# Altium PCB STM32H743I-EVAL2PCBDESIGN.PcbDoc (part 1 of 23)
Units mil, origin at the board's own origin, x right, y up, seen from the top; angles counter-clockwise.
Board outline 6558 x 5417 mil, 8 copper layers (L1_TOP, L2_GND, L3_HS1, L4_POWER, L5_SIG, L6_HS2, L7_GND, L8_BOTTOM), stack 61.368 mil thick; 620 components, 588 nets, 2945 pads, 1724 vias.
Unrouted connection lines stored in the file: 1.
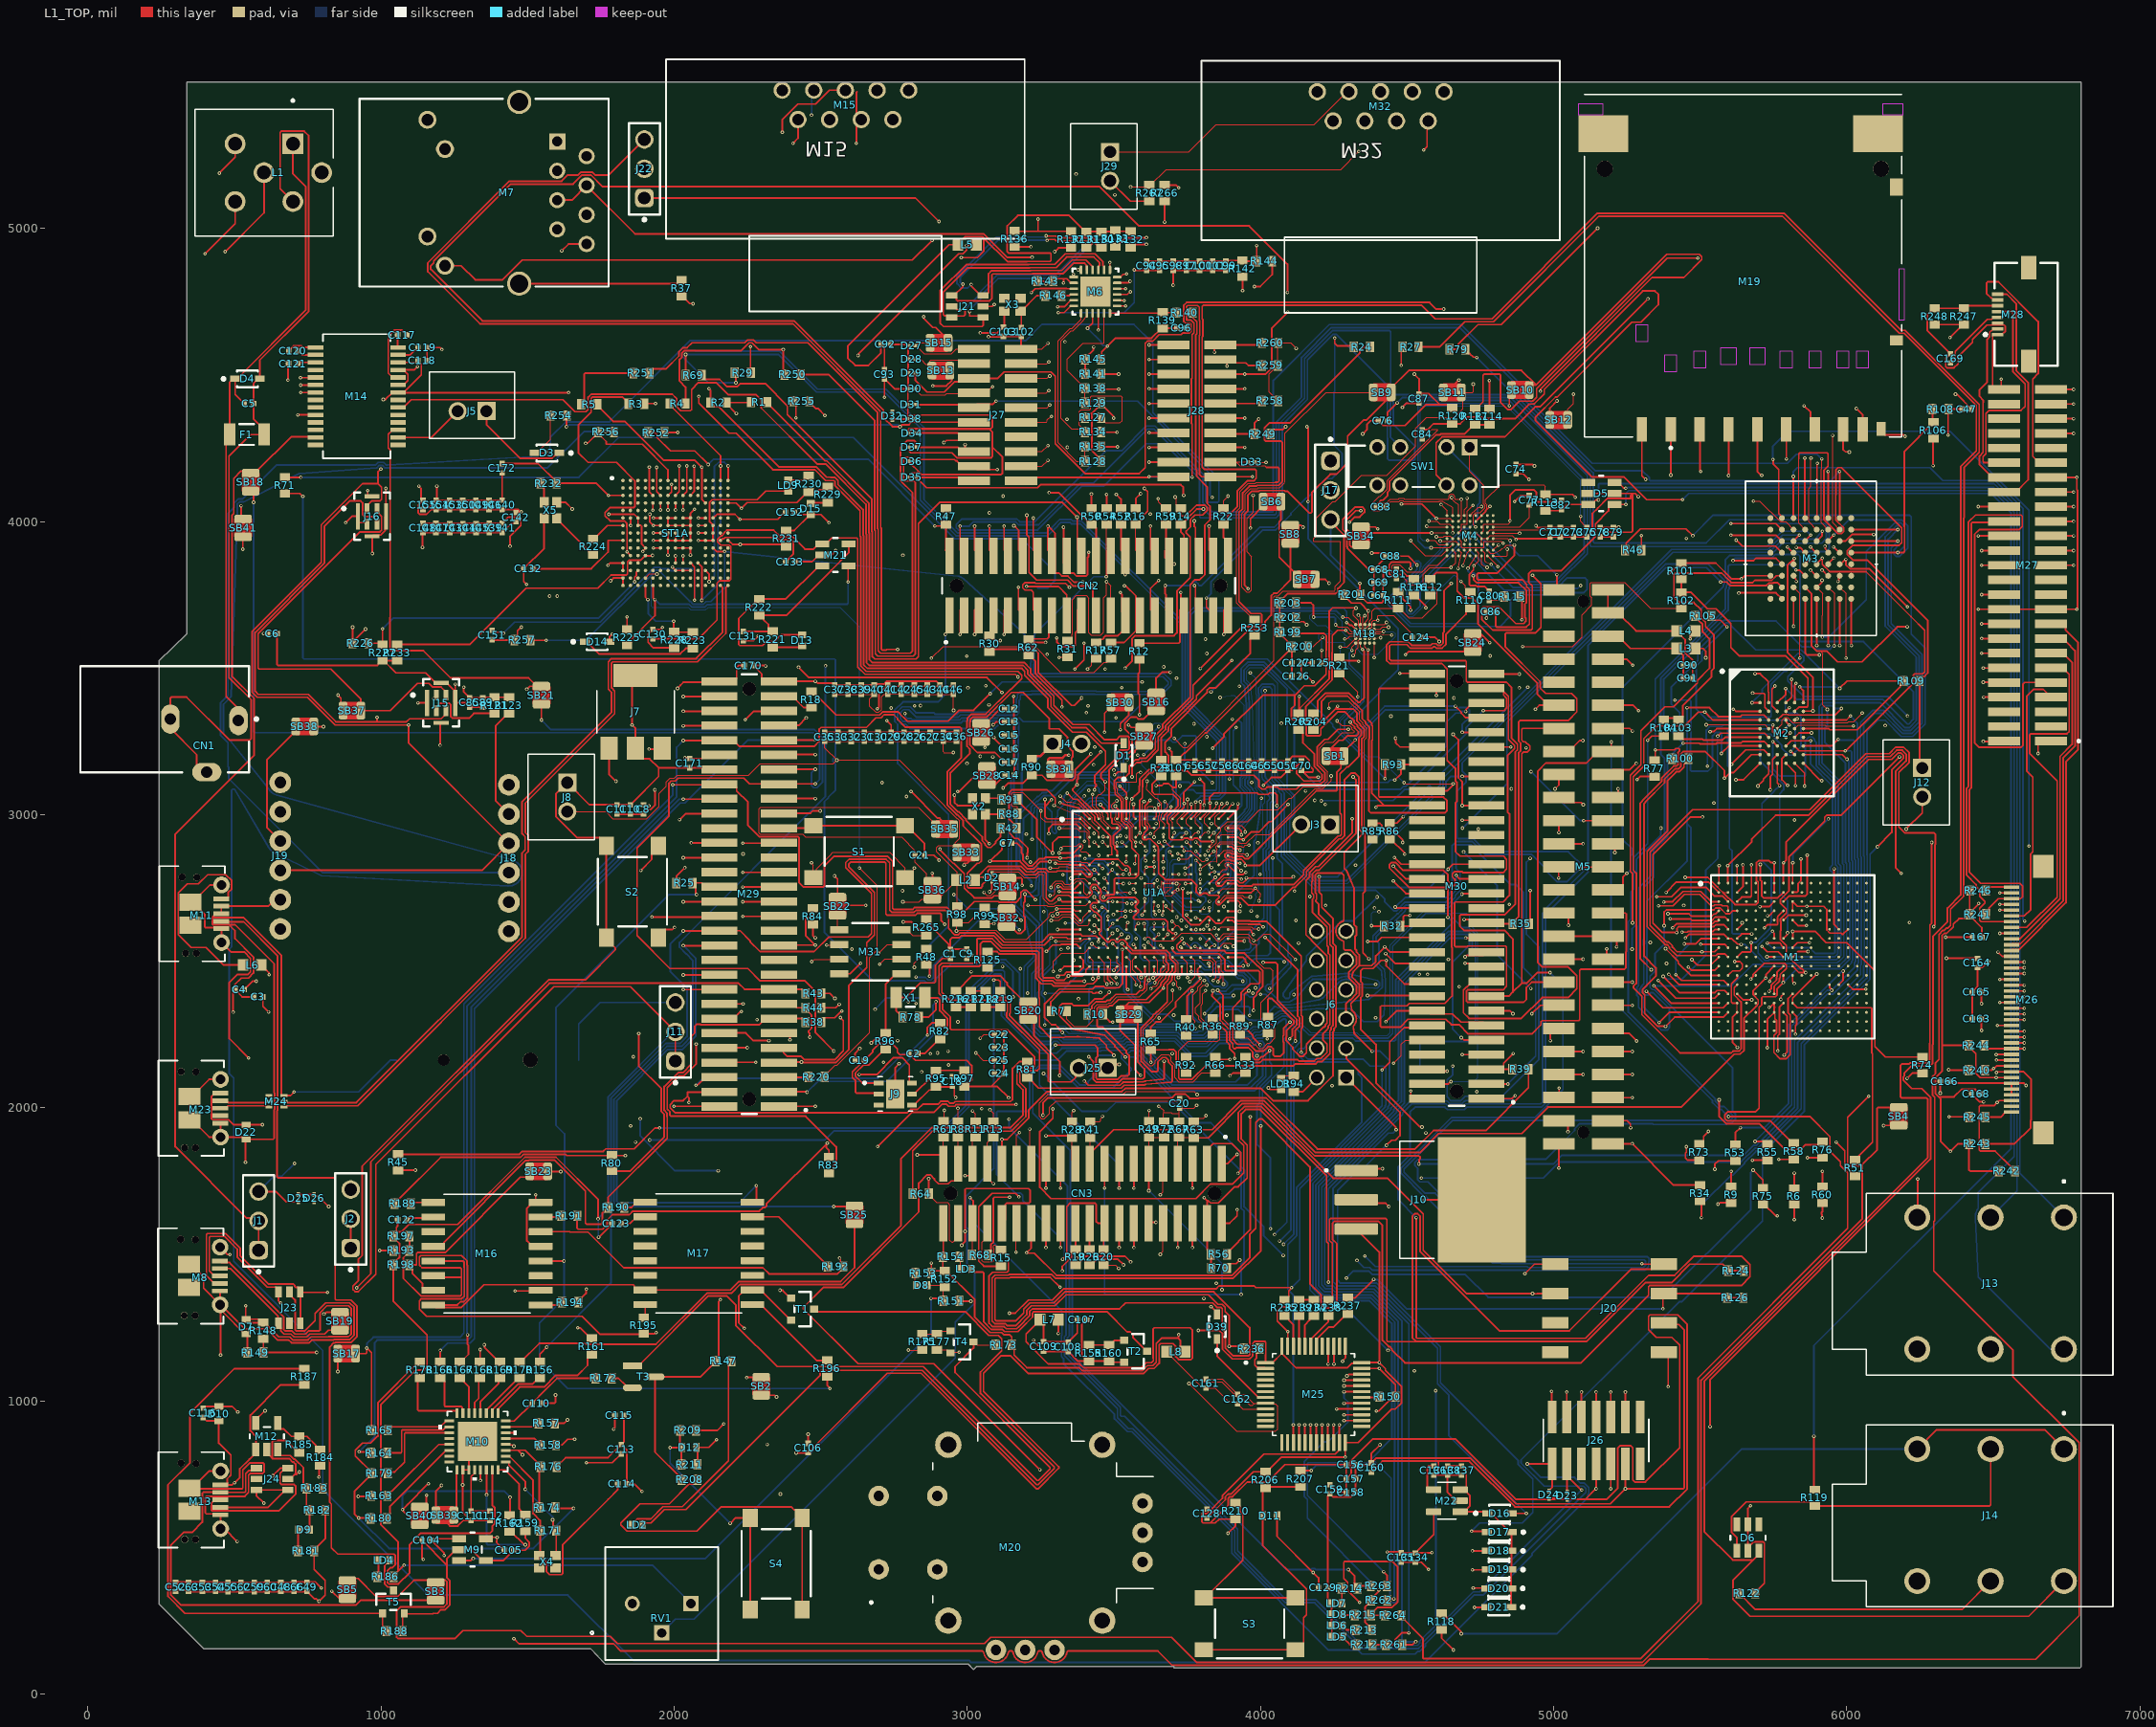
[diagram p0: L1_TOP view]
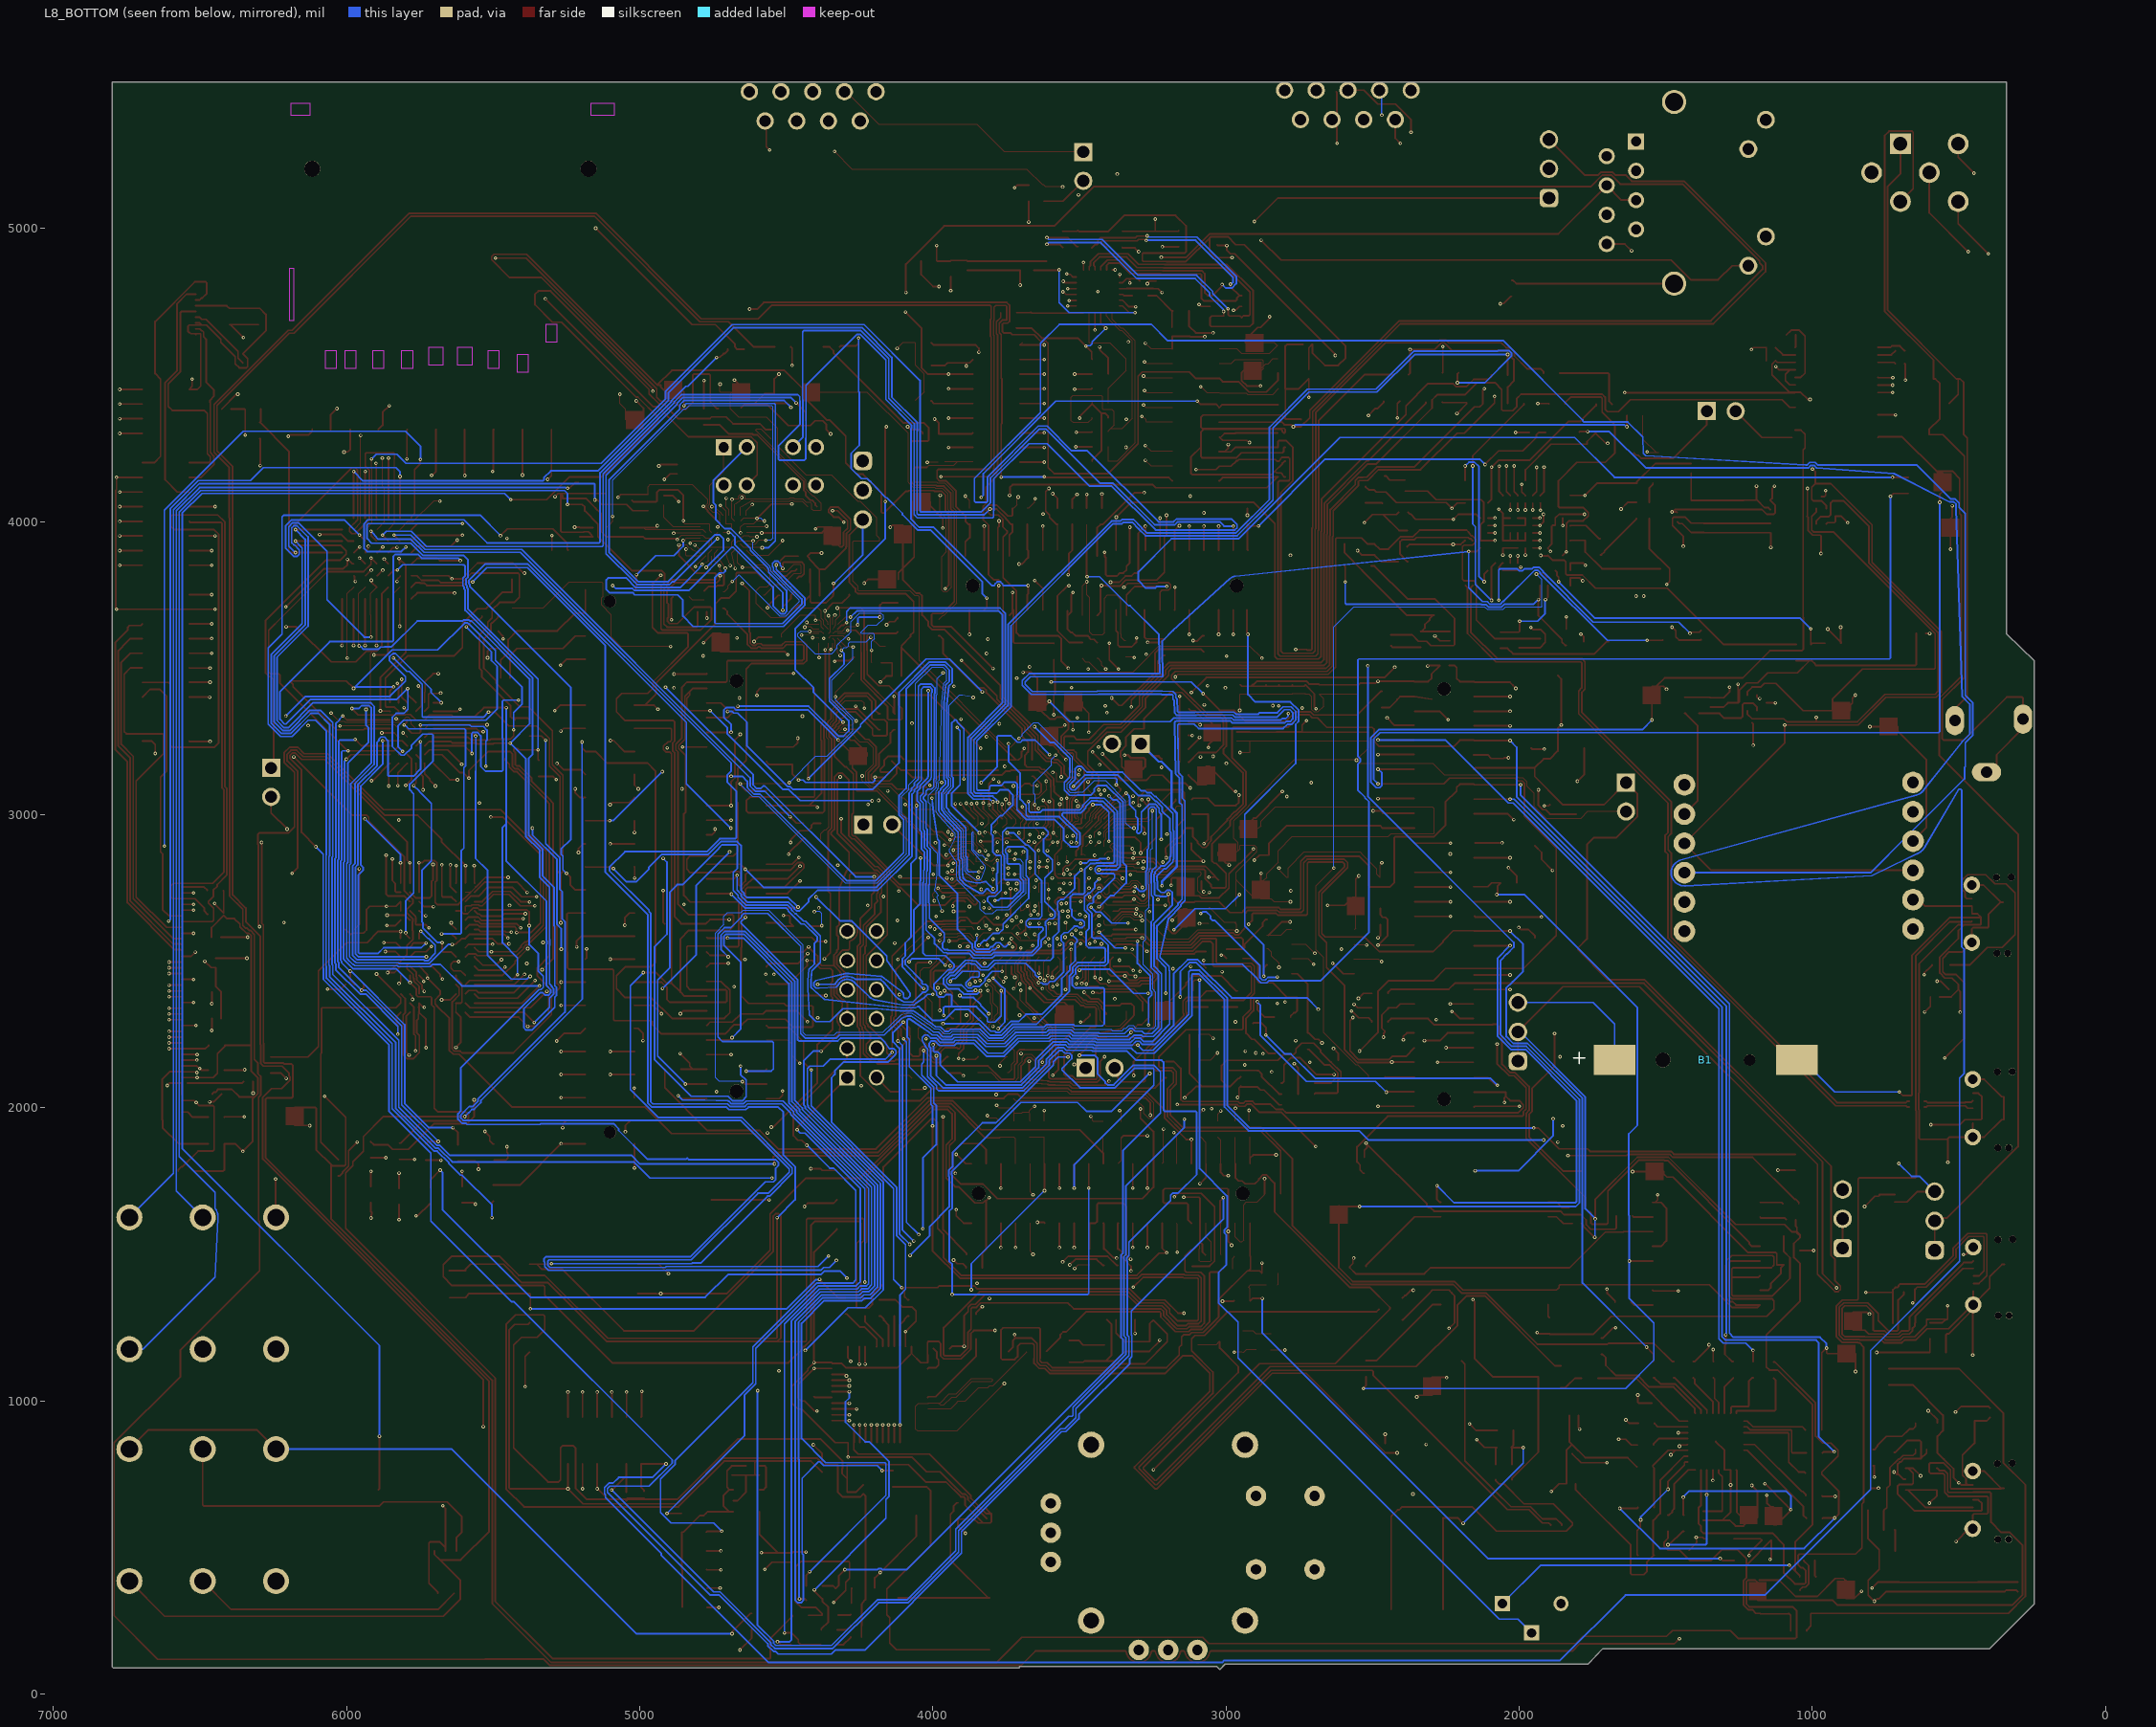
[diagram p1: L8_BOTTOM view, seen from below]
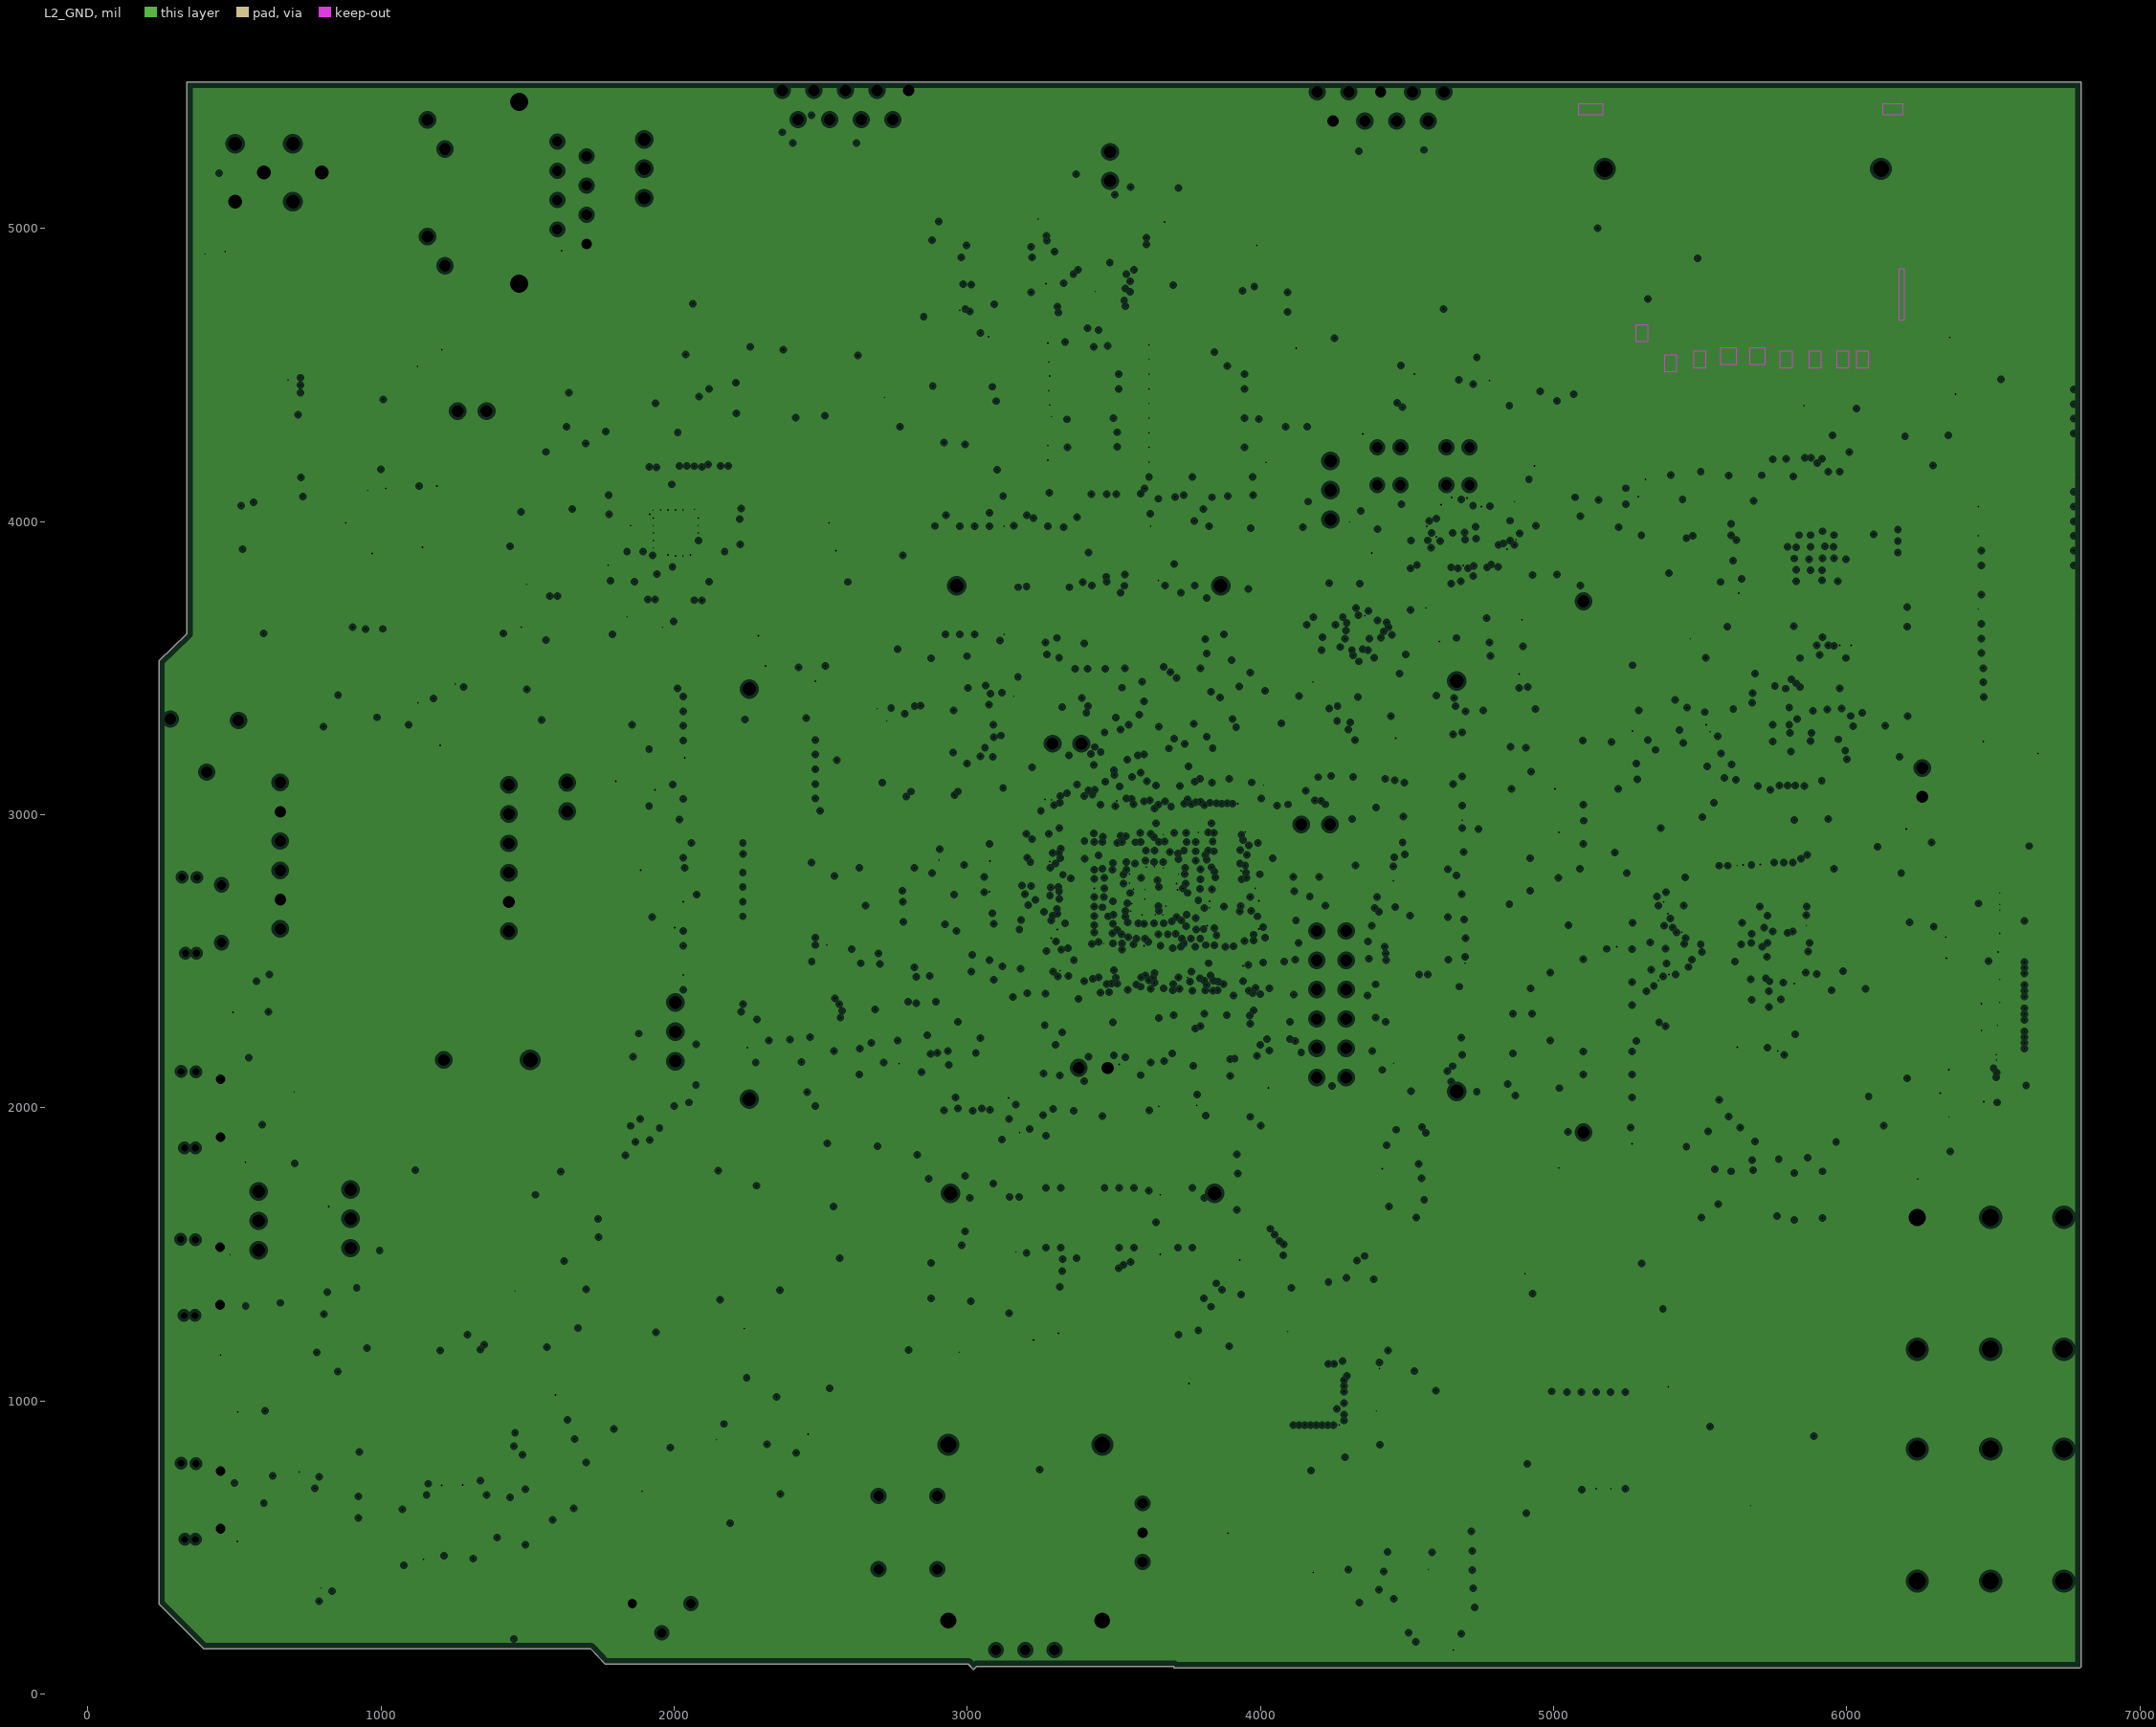
[diagram p2: L2_GND, clearances drawn from the general rule]
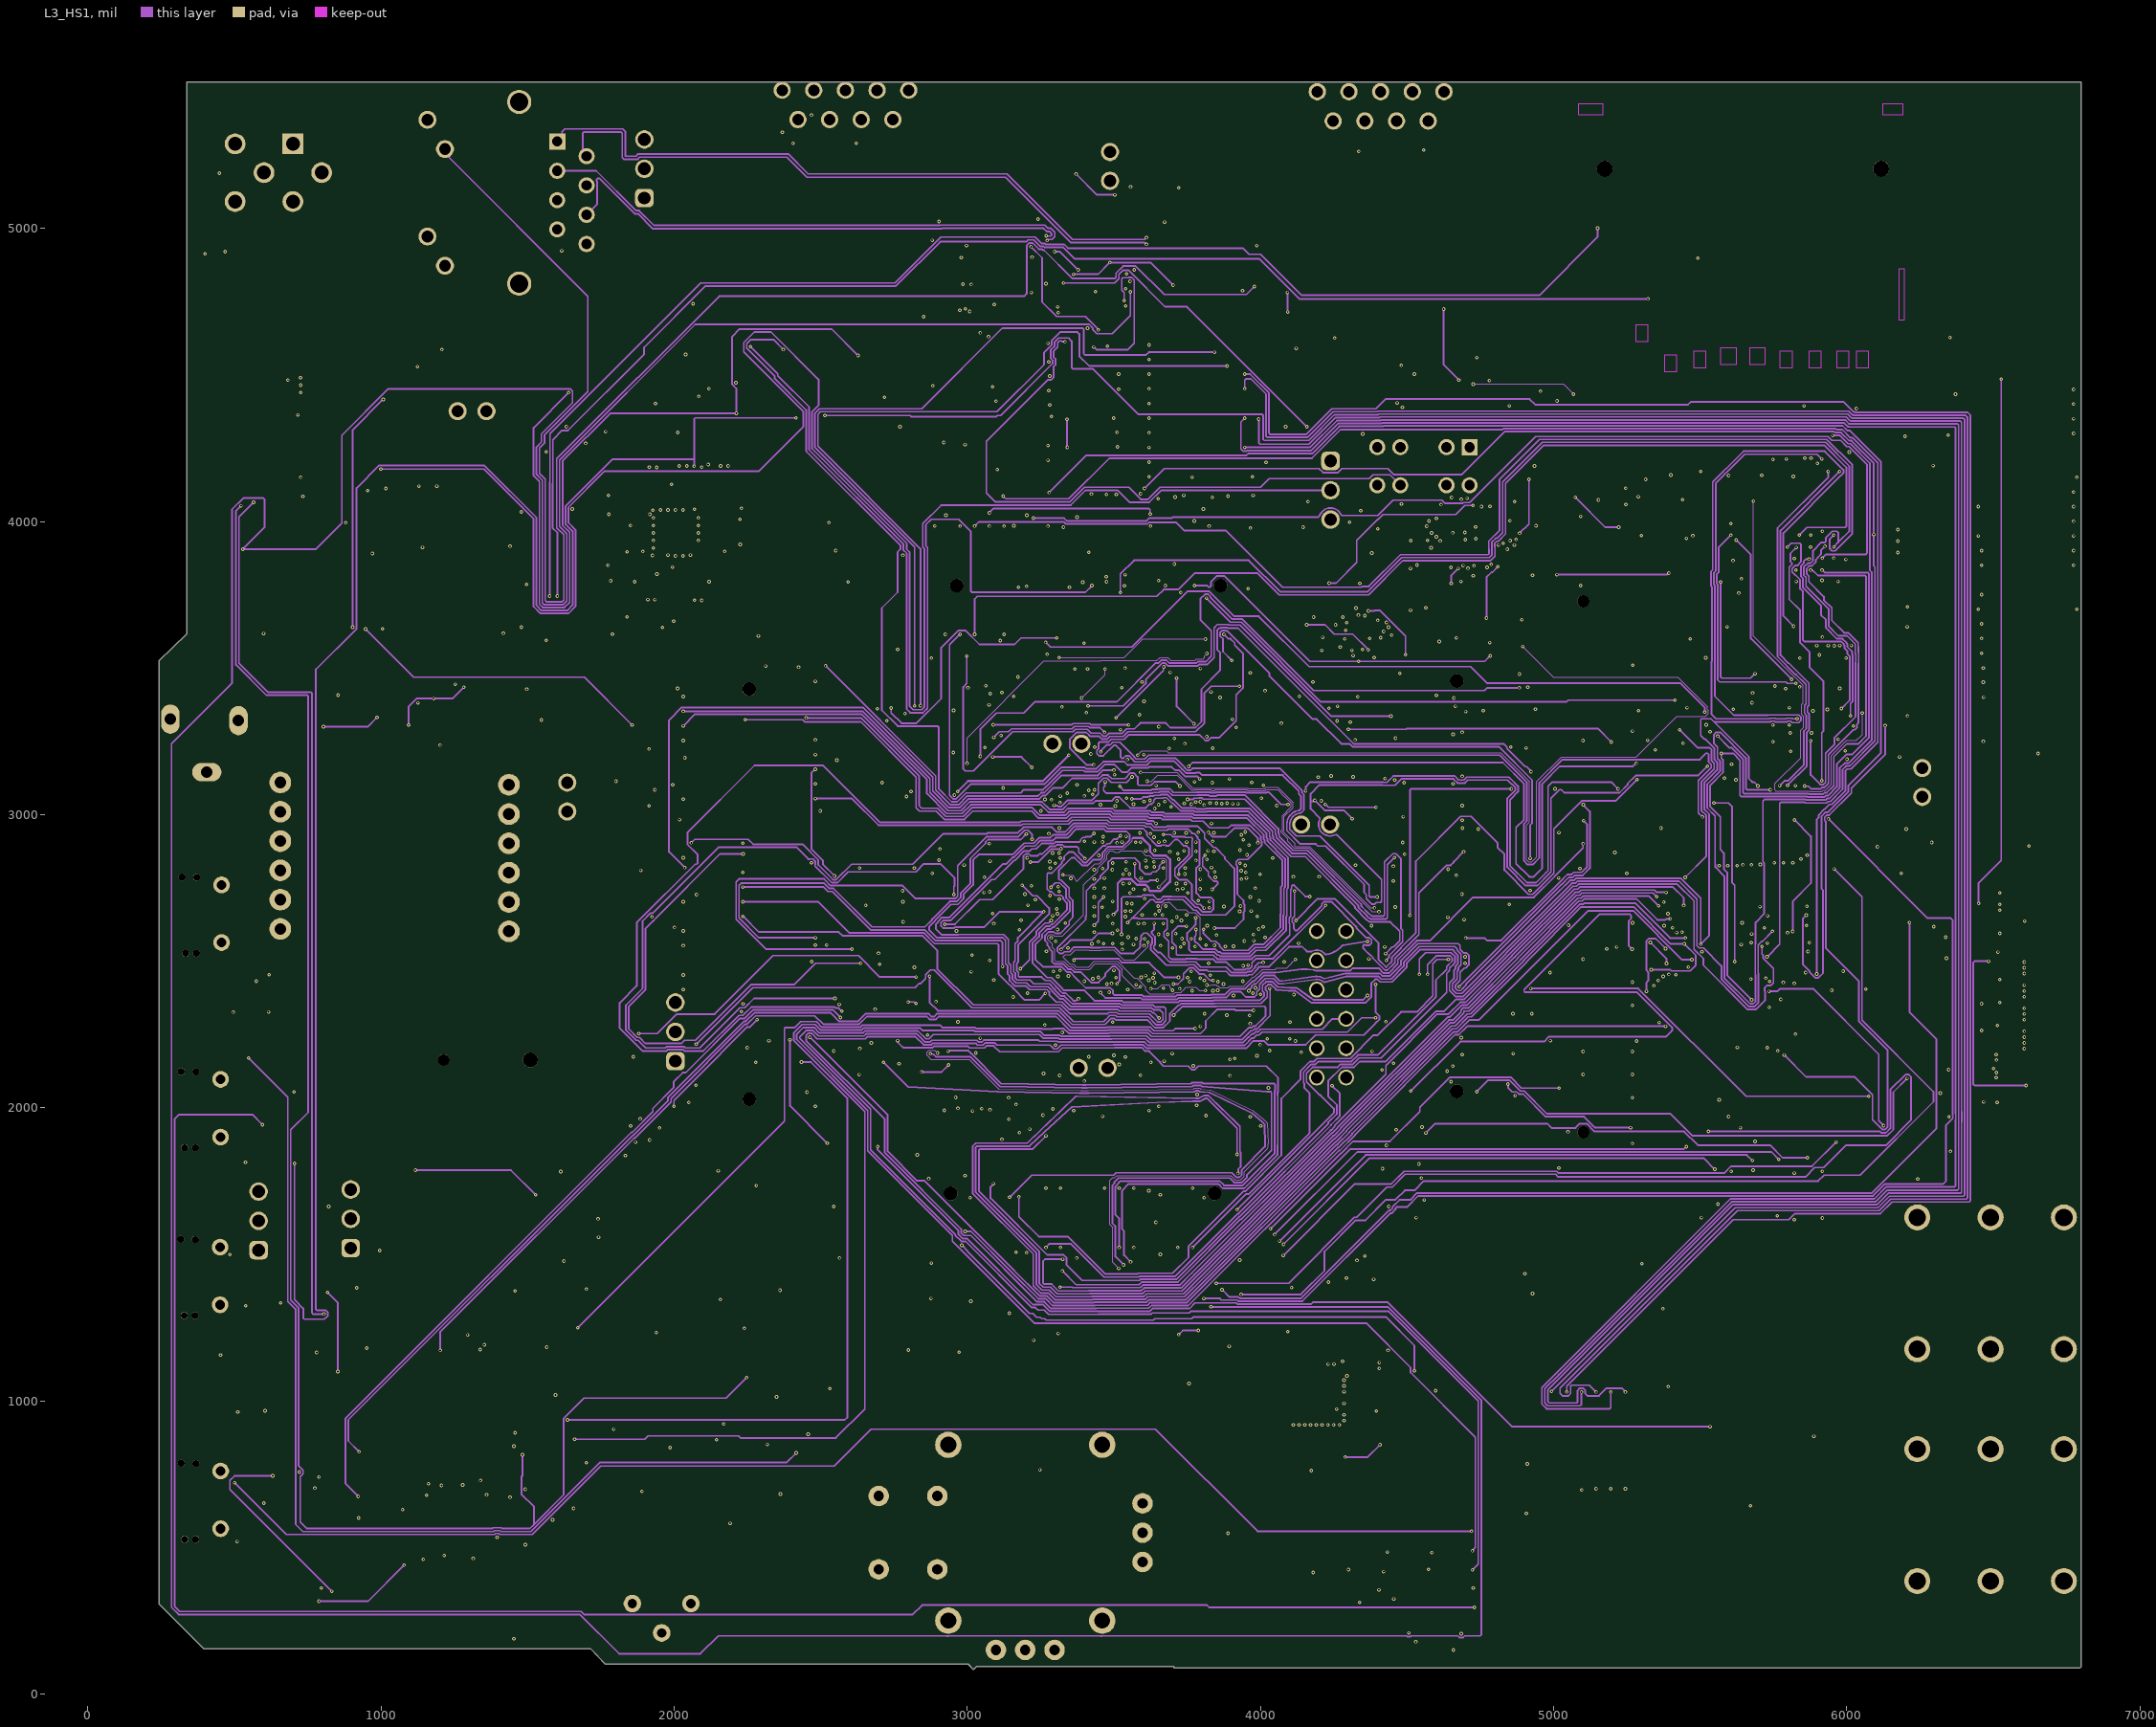
[diagram p3: L3_HS1]
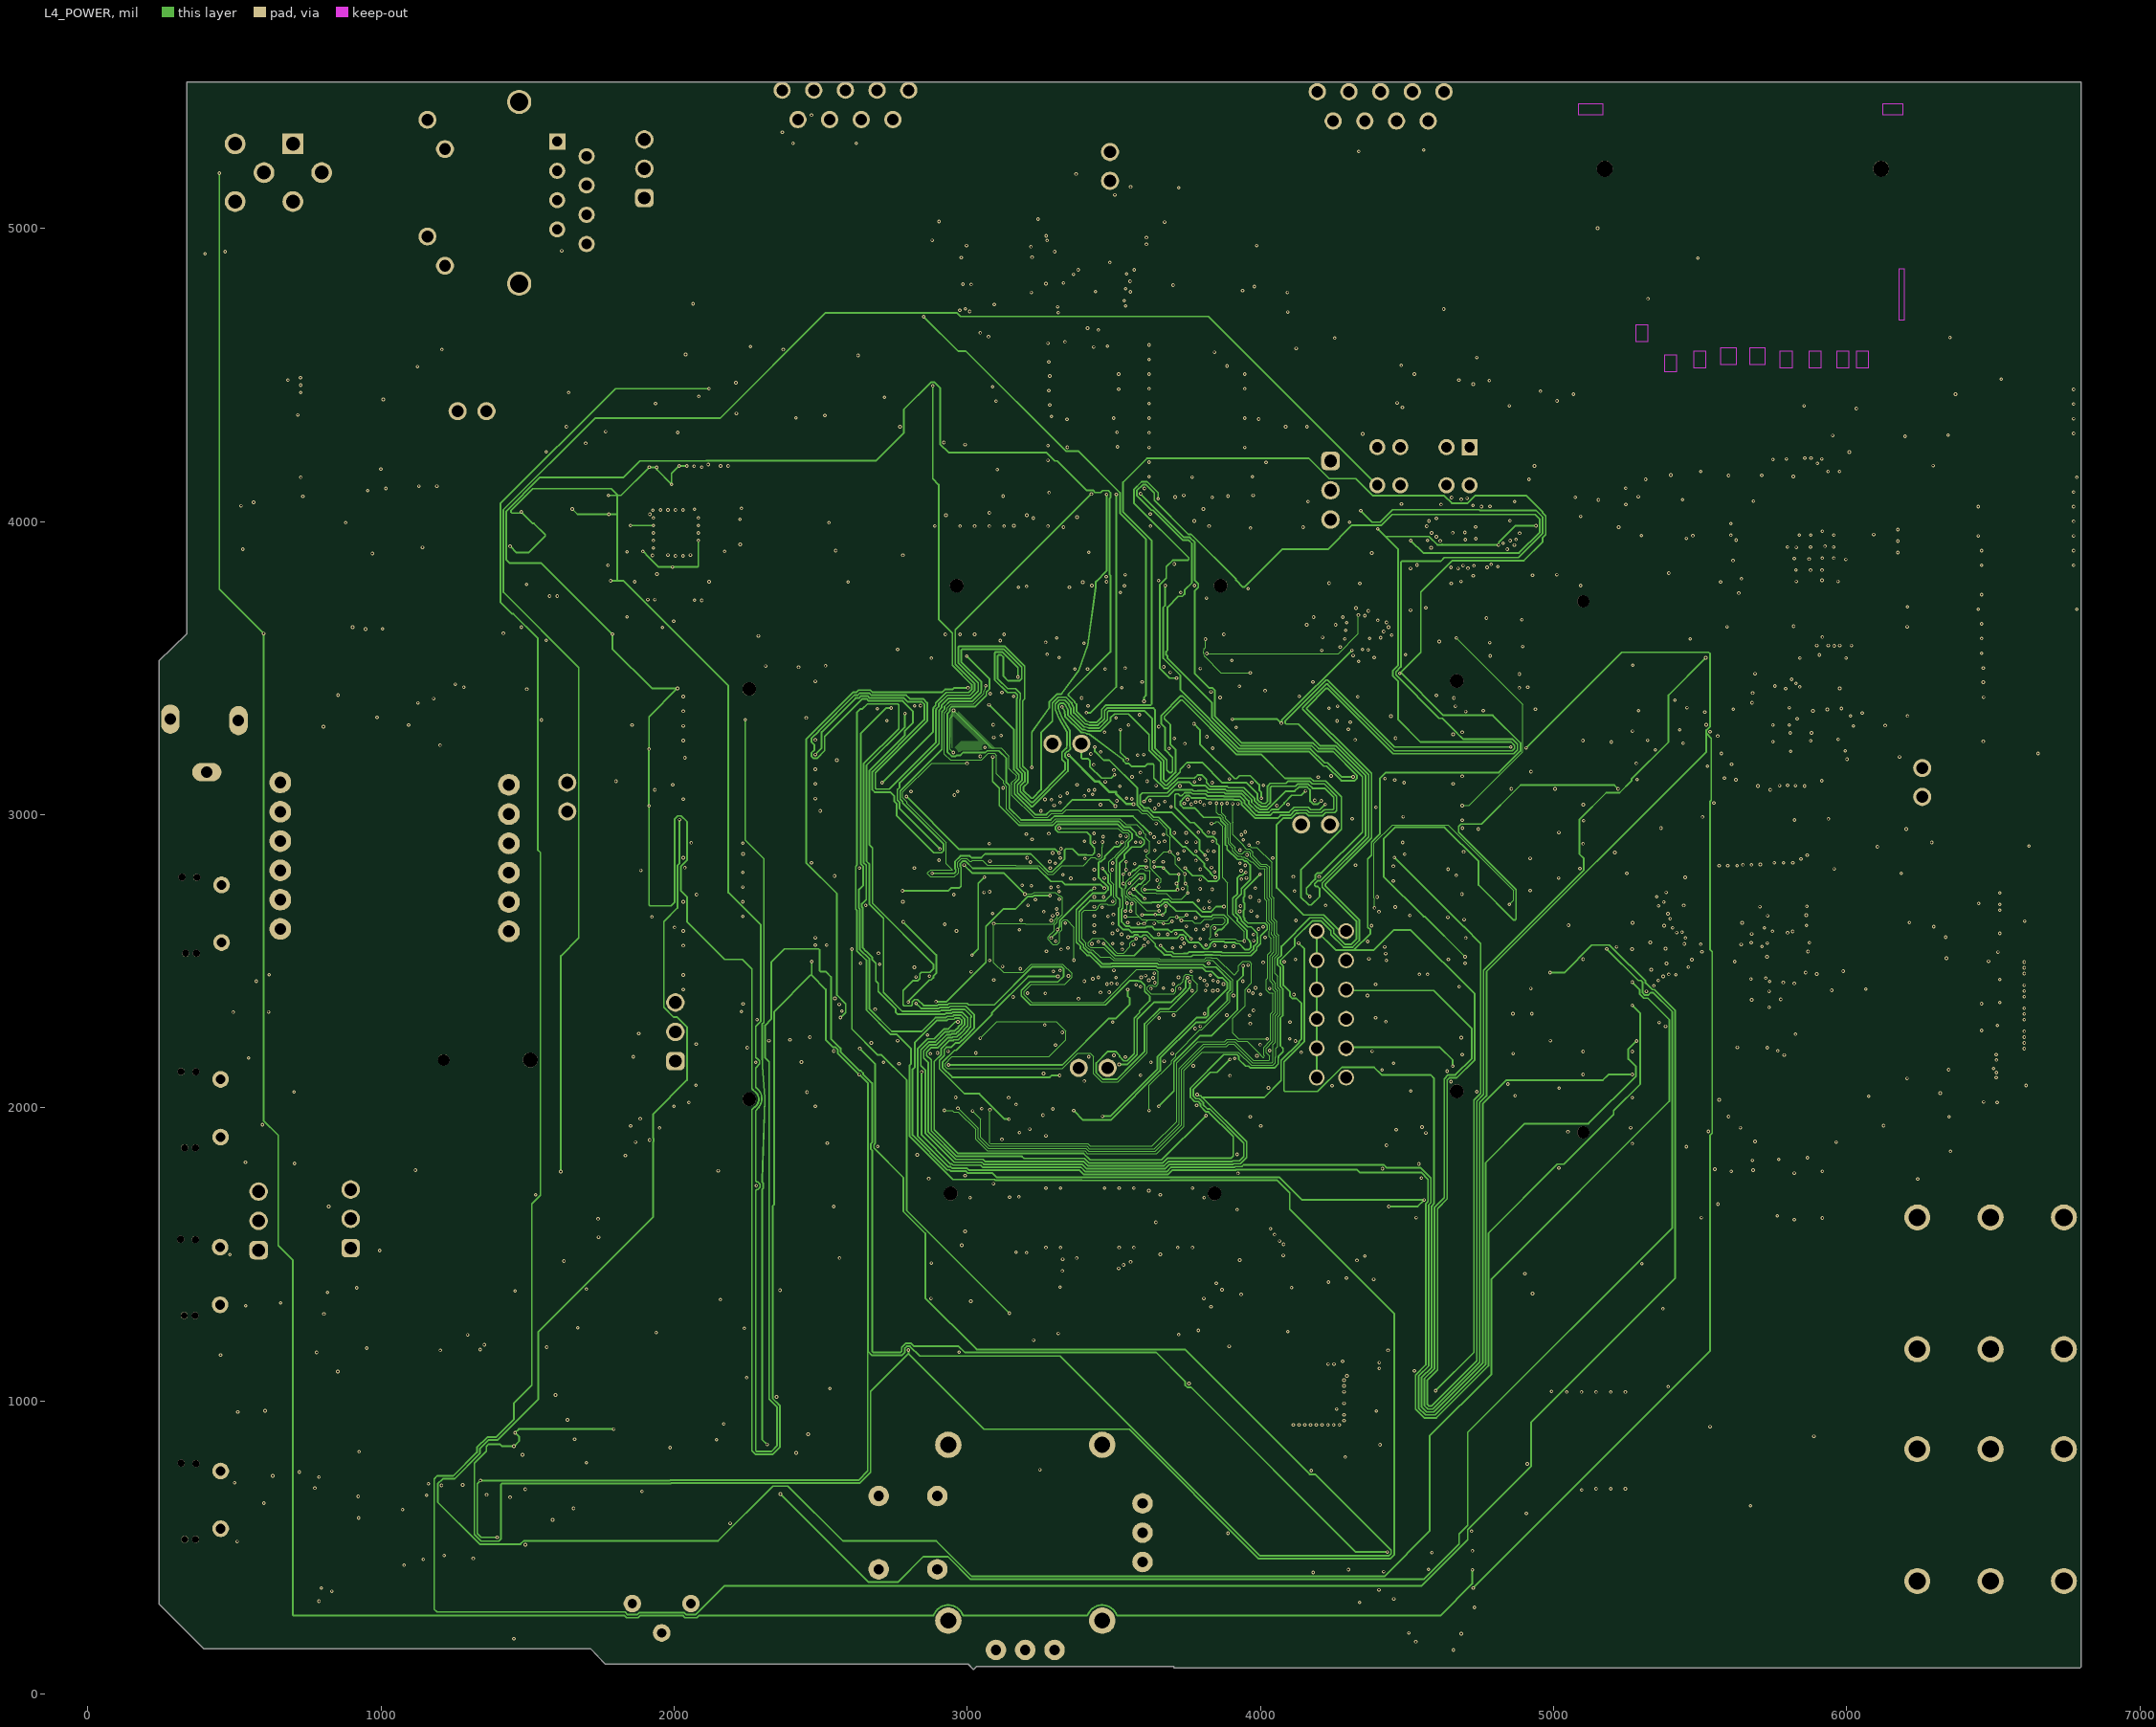
[diagram p4: L4_POWER]
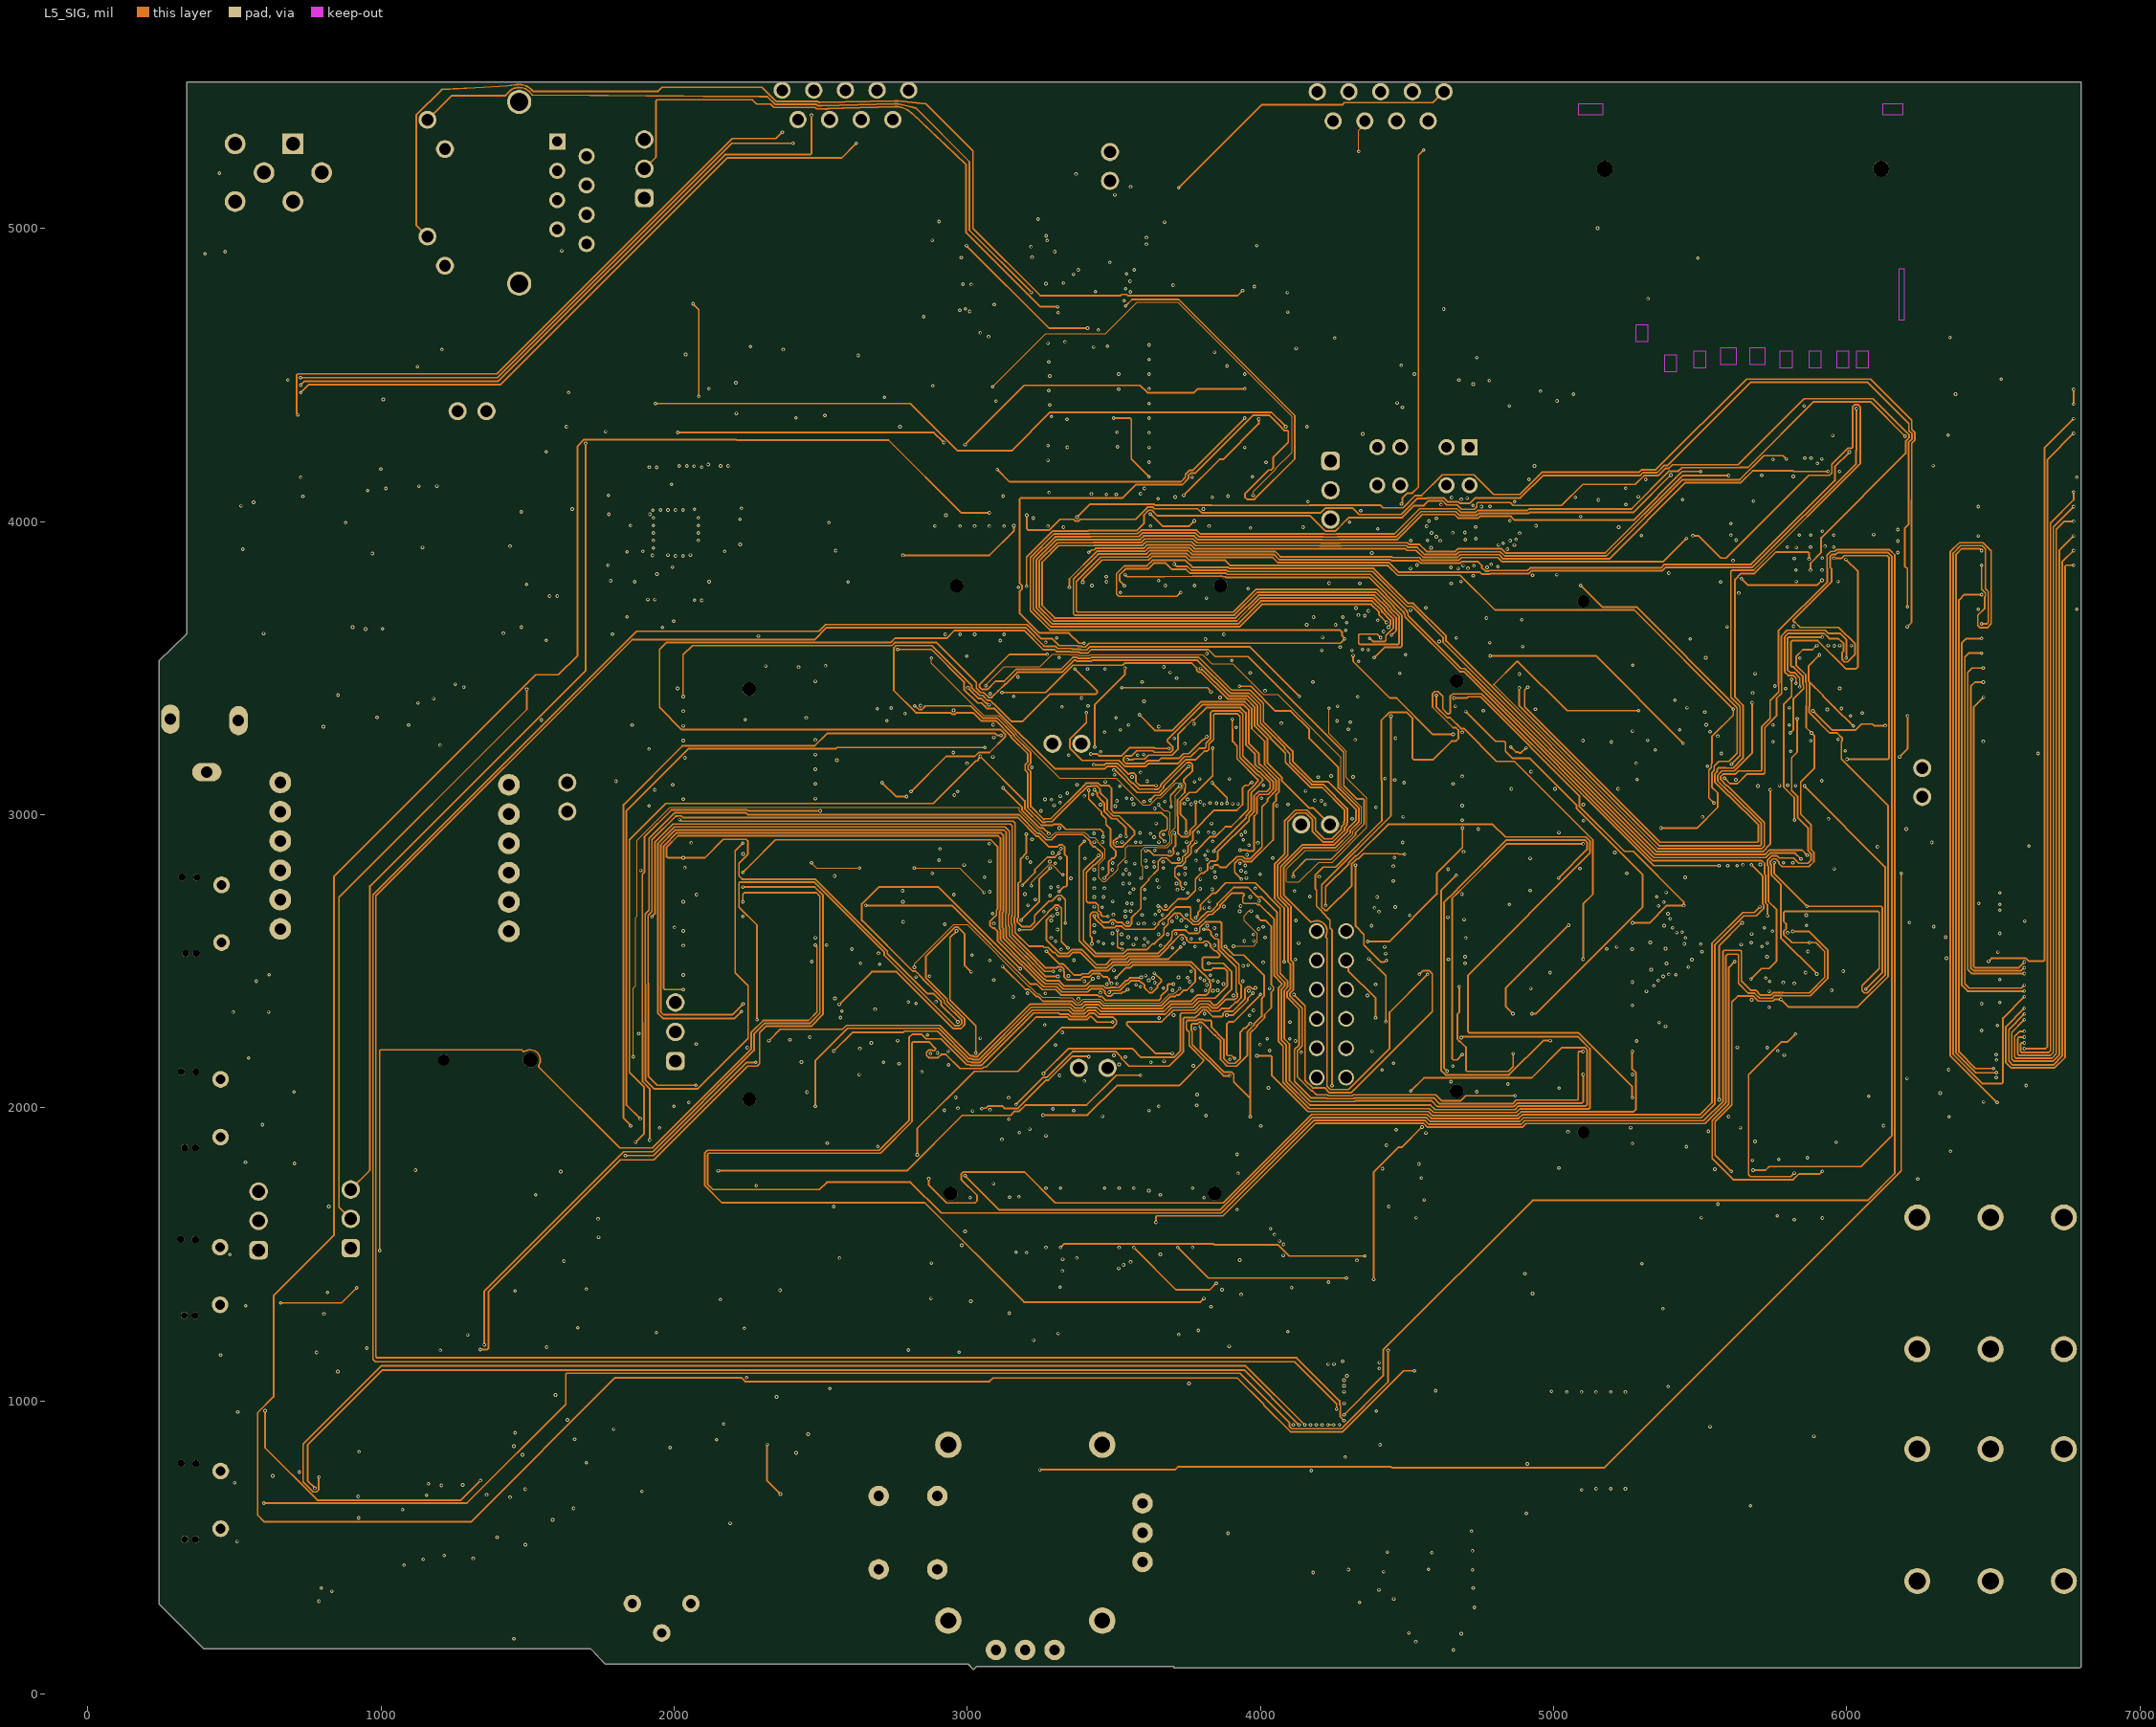
[diagram p5: L5_SIG]
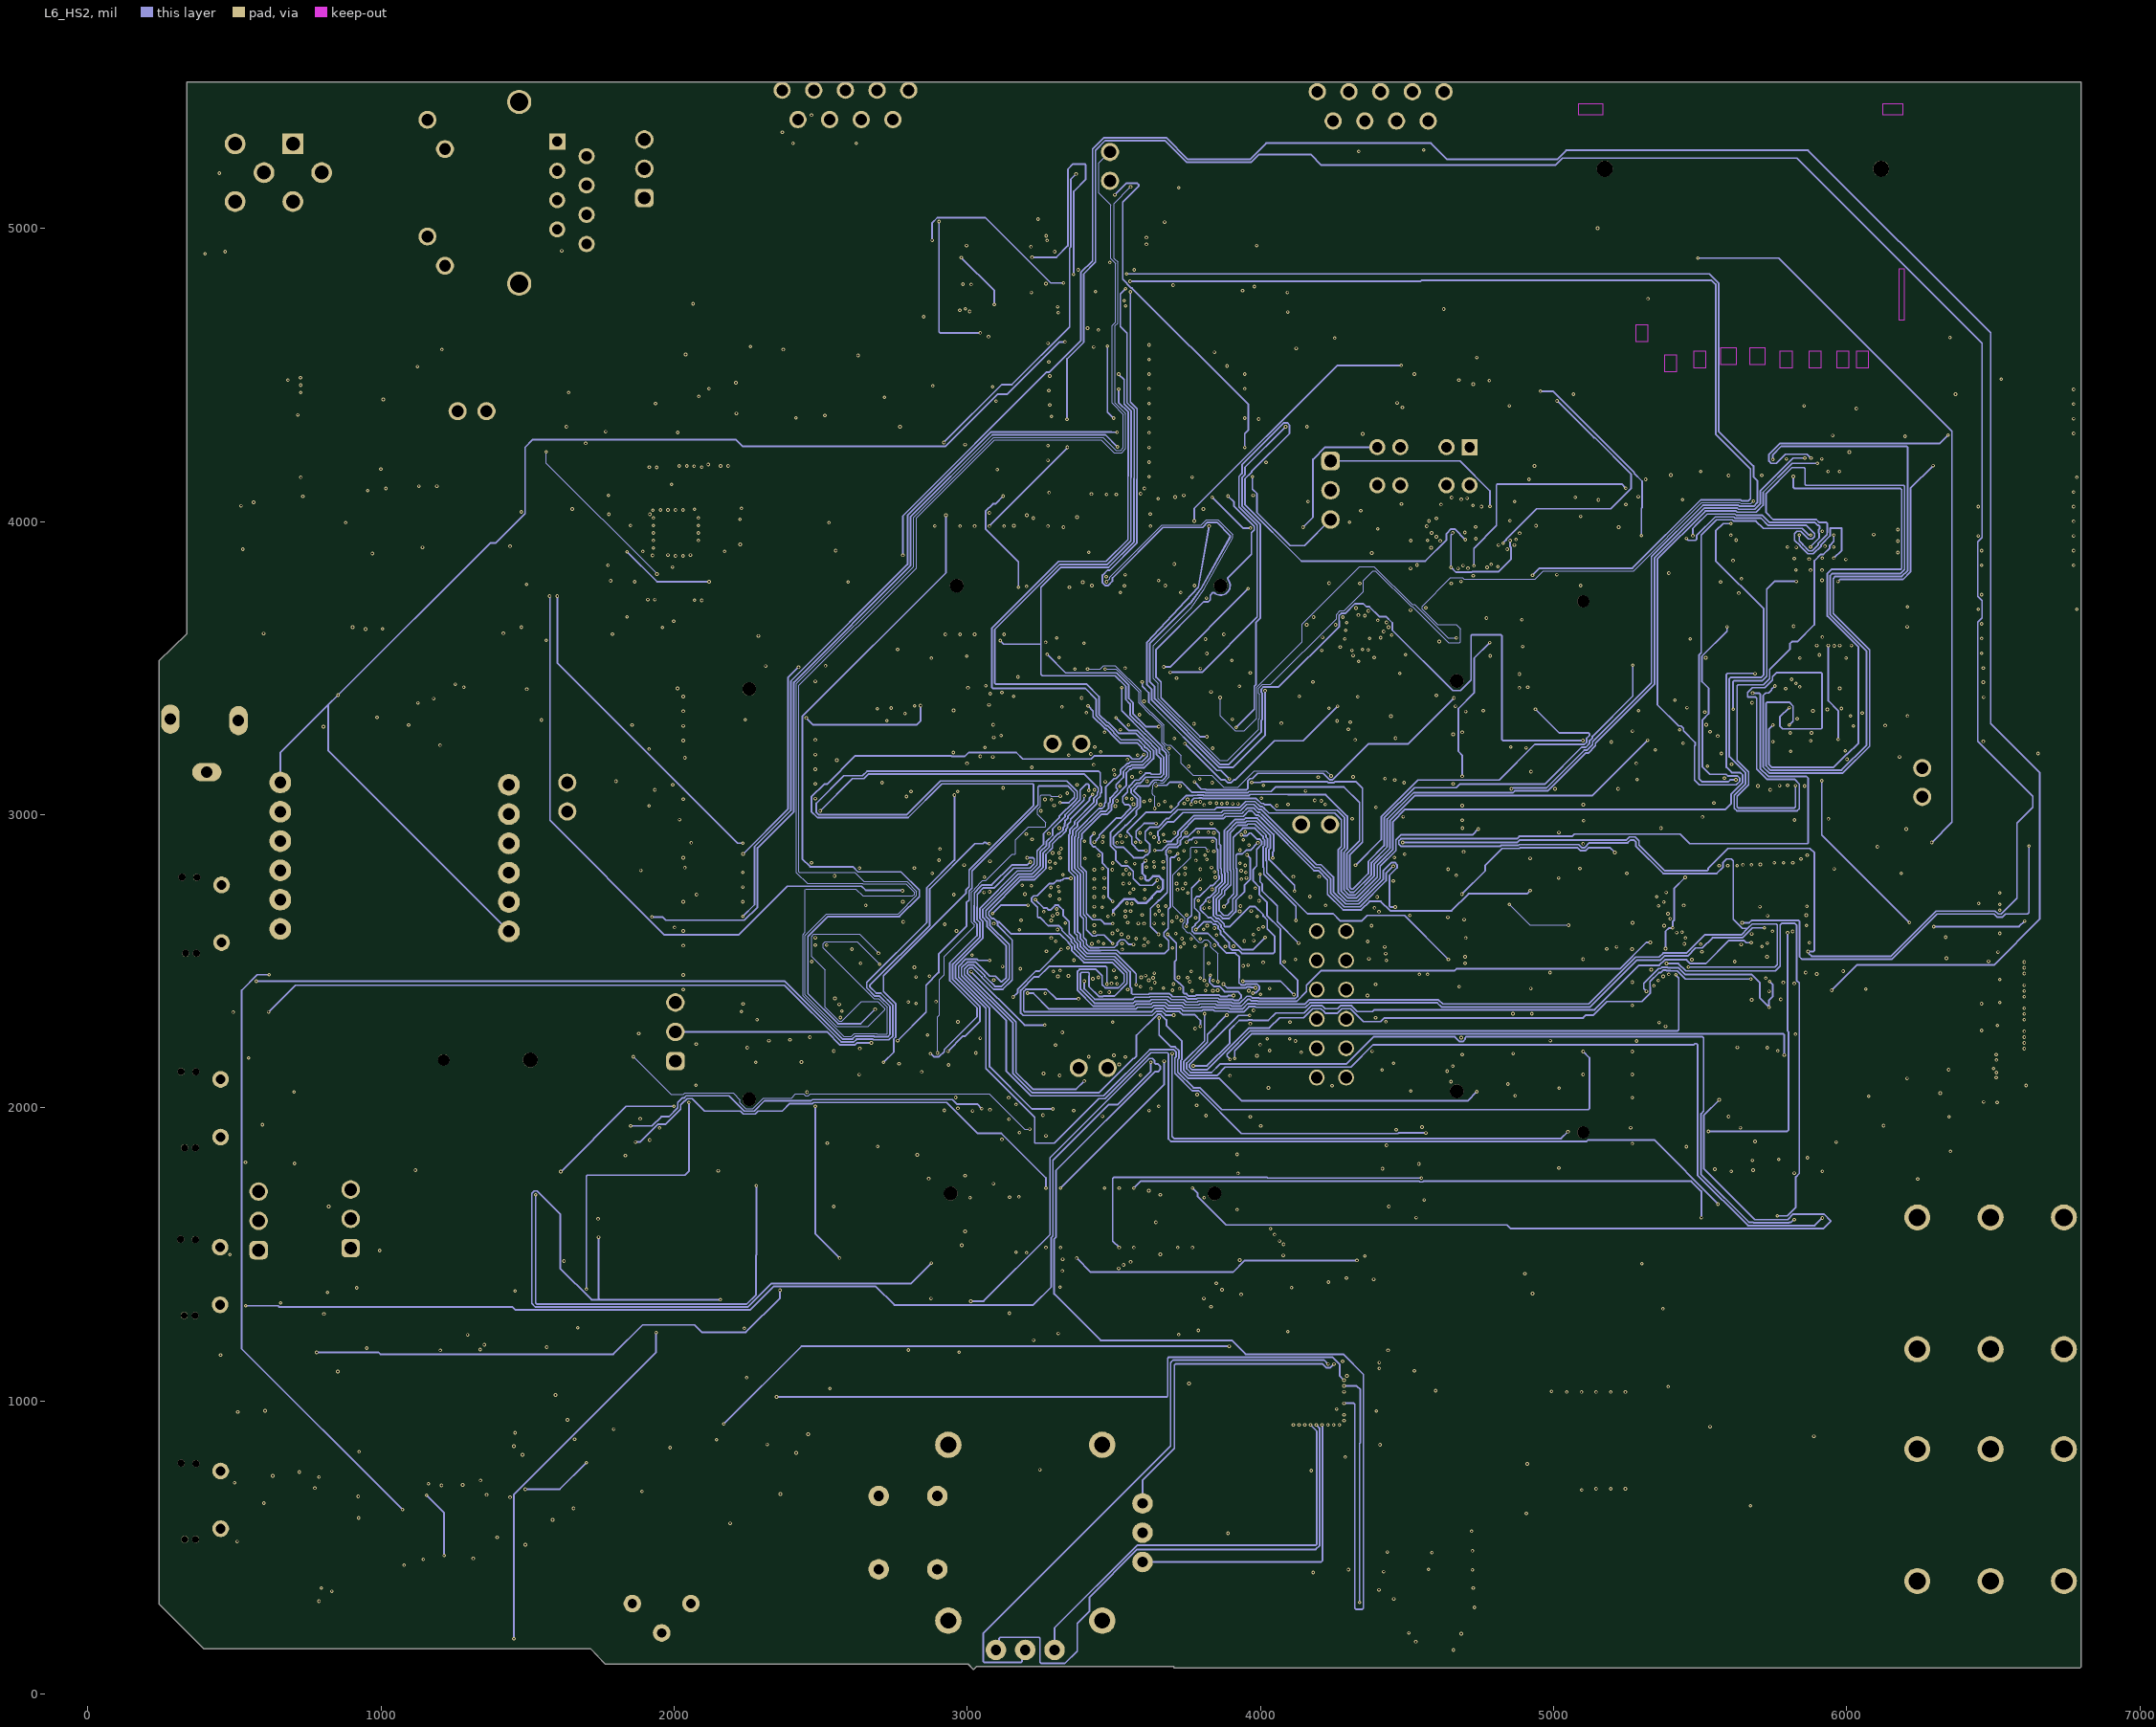
[diagram p6: L6_HS2]
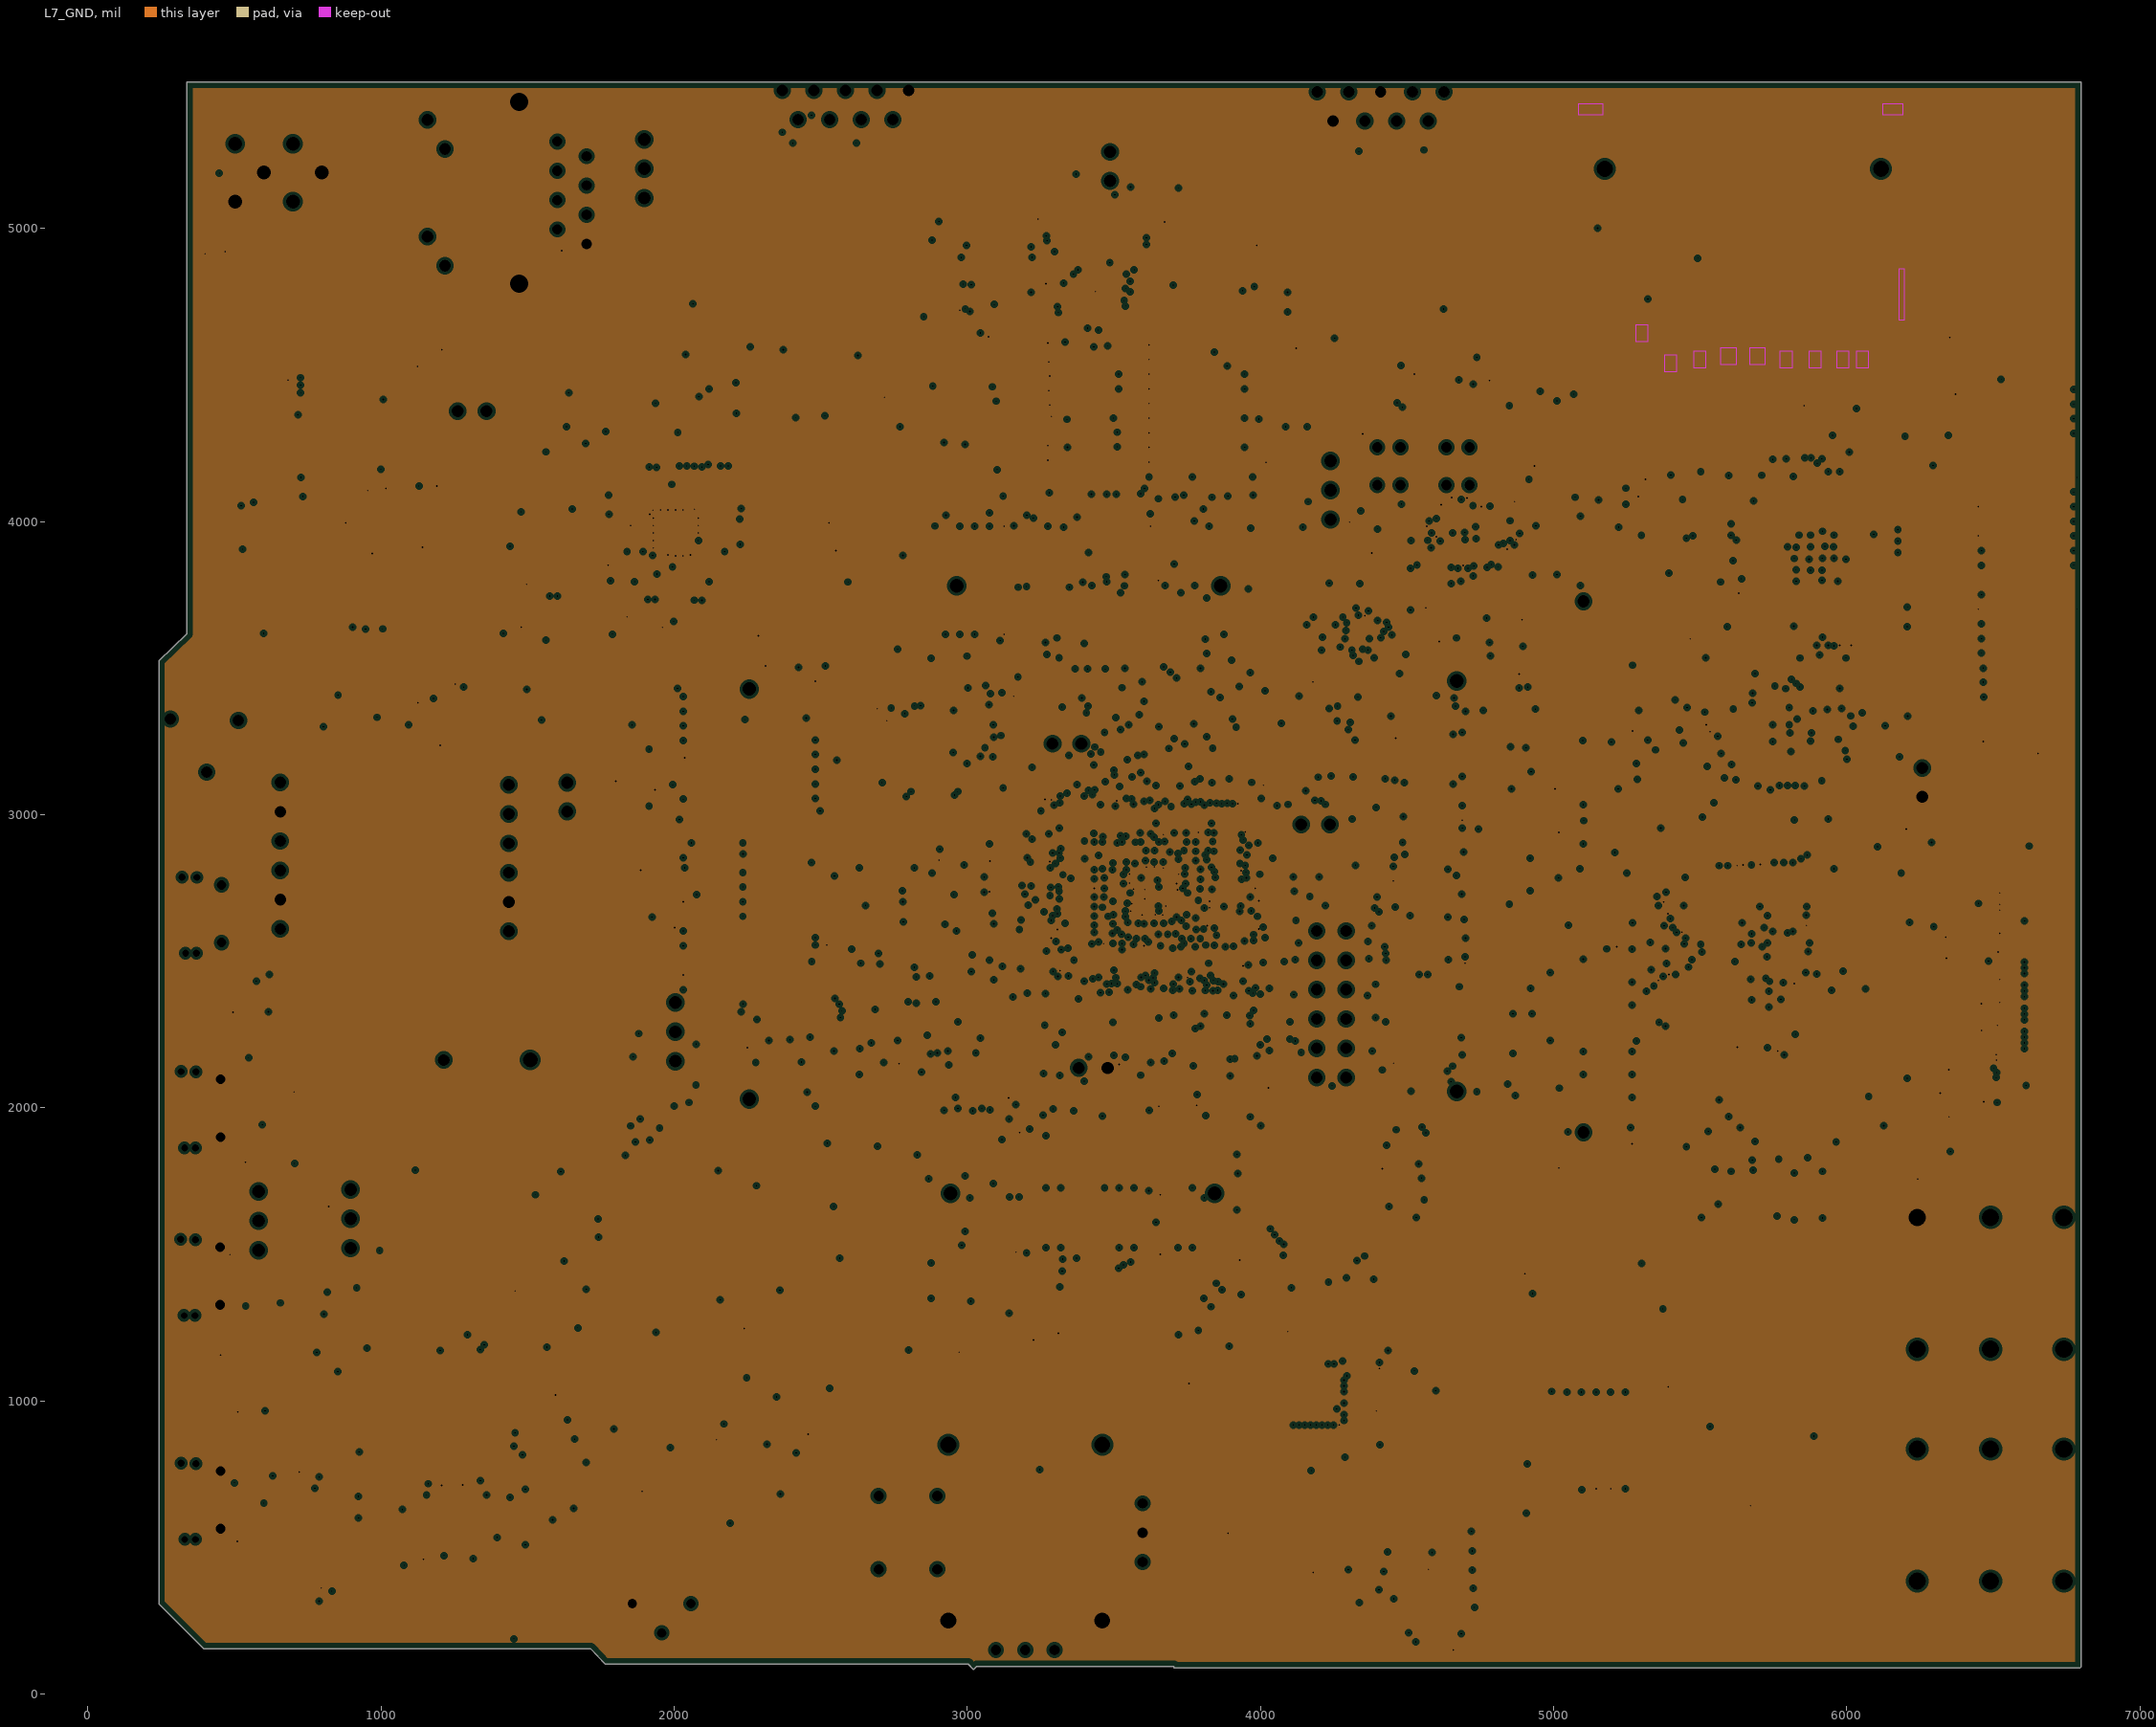
[diagram p7: L7_GND, clearances drawn from the general rule]

## Layer stack, top to bottom
Top Solder: solder mask 0.4, Solder Resist, Dk 3.5
L1_TOP: signal copper 1.378
Dielectric 6: prepreg 5, PP-006, Dk 4.1
L2_GND: plane copper 1.378, net GND
Dielectric 4: prepreg 5, PP-006, Dk 4.1
L3_HS1: signal copper 1.378
Dielectric 2: prepreg 5, PP-006, Dk 4.1
L4_POWER: signal copper 1.4
Dielectric 1: dielectric 22.5, FR-4, Dk 4.8
L5_SIG: signal copper 1.4
Dielectric 3: prepreg 2.8, PP-006, Dk 4.1
L6_HS2: signal copper 1.378
Dielectric 5: prepreg 5, PP-006, Dk 4.1
L7_GND: plane copper 1.378, net GND
Dielectric 7: prepreg 5, PP-006, Dk 4.1
L8_BOTTOM: signal copper 1.378
Bottom Solder: solder mask 0.4, Solder Resist, Dk 3.5

## Board outline
3705,89 6797,89 6800,93 6800,5500 337,5500 337,3617 242,3525 242,307 394.5,154.5 1714.5,154.5 1765.32,101.26 3002.74,101.26 3021,83 3032,94 3705,94

## Design rules (kind name [scope] priority, off if disabled: settings)
Clearance USB_AB_Tight_Clearance [InComponent('M4') OR InComponent('M11') OR InComponent('M13') OR InComponent('M23') OR InComponent('M2') OR InComponent('M1') OR InComponent('ST1A') OR InComponent('U1A') OR InComponent('M18') OR InComponent('M3') vs IsTrack] p1: gap=3 ignorepadtopadclearanceinfootprint=TRUE except(1: Arc-Arc Arc-Track Arc-SMDPad Track-Track Track-SMDPad SMDPad-SMDPad SMDPad-Via Via-Via; 5: Arc-Hole Track-Hole SMDPad-Hole THPad-Hole Via-Hole Fill-Hole Poly-Hole Region-Hole Text-Text Text-Hole)
Clearance [All] p2: gap=5 ignorepadtopadclearanceinfootprint=TRUE except(4: Arc-Arc Arc-Track Arc-SMDPad Arc-Via Track-Track Track-SMDPad Track-Via SMDPad-SMDPad SMDPad-Via Via-Via; 6: Arc-Hole Track-Hole SMDPad-Hole THPad-Hole Via-Hole Fill-Hole Poly-Hole Region-Hole Text-Text Text-Hole)
DiffPairsRouting [All] p1: maxlimit=10 minlimit=5 mostfreqgap=6 toplayer_minwidth=4 toplayer_maxwidth=20 toplayer_prefwidth=6 midlayer1_minwidth=4 midlayer1_maxwidth=20 midlayer1_prefwidth=6 midlayer2_minwidth=4 midlayer2_maxwidth=20 midlayer2_prefwidth=6 midlayer3_minwidth=4 midlayer3_maxwidth=20 midlayer3_prefwidth=6 midlayer4_minwidth=4 midlayer4_maxwidth=20 midlayer4_prefwidth=6 bottomlayer_minwidth=4 bottomlayer_maxwidth=20 bottomlayer_prefwidth=6 maxuncoupledlength=500
Height [All] p1: minheight=0 maxheight=1200 prefheight=500
MinimumSolderMaskSliver [All] p1: minsoldermaskwidth=3.15
PlaneClearance [All] p1: clearance=10
PlaneConnect [All] p1: pad.planeconnectstyle=Relief pad.reliefexpansion=20 pad.reliefentries=4 pad.reliefconductorwidth=20 pad.reliefairgap=10 via.planeconnectstyle=Direct via.reliefexpansion=20 via.reliefentries=4 via.reliefconductorwidth=10 via.reliefairgap=10
PolygonConnect [All] p1: connectstyle=Relief reliefconductorwidth=10 reliefentries=4 polygonreliefangle="90 Angle" airgapwidth=10
RoutingVias RoutingVias_1 [InComponent('M4')] p1: holewidth=2.5 width=5 viastyle="Through Hole" minholewidth=2.5 minwidth=5 maxholewidth=2.5 maxwidth=5
RoutingVias [All] p2: holewidth=6 width=12 viastyle="Through Hole" minholewidth=6 minwidth=12 maxholewidth=6 maxwidth=12
SolderMaskExpansion [All] p1: expansion=0 istentingtop=FALSE
SupplyNets "Schematic Supply Nets_23" [InNet('VDD')] p1: voltage=0.000
SupplyNets "Schematic Supply Nets_22" [InNet('BLVDD')] p2: voltage=0.000
SupplyNets "Schematic Supply Nets_21" [InNet('VBUS_FS2')] p3: voltage=0.000
SupplyNets "Schematic Supply Nets_20" [InNet('+2V9')] p4: voltage=0.000
SupplyNets "Schematic Supply Nets_19" [InNet('+1V8')] p5: voltage=0.000
SupplyNets "Schematic Supply Nets_18" [InNet('VBUS_FS1')] p6: voltage=0.000
SupplyNets "Schematic Supply Nets_17" [InNet('+2V9_SD')] p7: voltage=0.000
SupplyNets "Schematic Supply Nets_16" [InNet('+3V3_ST_LINK')] p8: voltage=0.000
SupplyNets "Schematic Supply Nets_15" [InNet('GND')] p9: voltage=0.000
SupplyNets "Schematic Supply Nets_14" [InNet('VBUS-HS')] p10: voltage=0.000
SupplyNets "Schematic Supply Nets_13" [InNet('DSI_VDD12')] p11: voltage=0.000
SupplyNets "Schematic Supply Nets_12" [InNet('VBUS_HS')] p12: voltage=0.000
SupplyNets "Schematic Supply Nets_11" [InNet('E5V')] p13: voltage=0.000
SupplyNets "Schematic Supply Nets_10" [InNet('U5V_ST_LINK')] p14: voltage=0.000
SupplyNets "Schematic Supply Nets_9" [InNet('T_VSS')] p15: voltage=0.000
SupplyNets "Schematic Supply Nets_8" [InNet('VDD_MCU')] p16: voltage=0.000
SupplyNets "Schematic Supply Nets_7" [InNet('BLGND')] p17: voltage=0.000
SupplyNets "Schematic Supply Nets_6" [InNet('VREF+')] p18: voltage=0.000
SupplyNets "Schematic Supply Nets_5" [InNet('VDDA')] p19: voltage=0.000
SupplyNets "Schematic Supply Nets_4" [InNet('D5V')] p20: voltage=0.000
SupplyNets "Schematic Supply Nets_3" [InNet('VDD_SDC')] p21: voltage=0.000
SupplyNets "Schematic Supply Nets_2" [InNet('VUSB_ST_LINK')] p22: voltage=0.000
SupplyNets "Schematic Supply Nets_1" [InNet('+1V8_LDO')] p23: voltage=0.000
SupplyNets "Schematic Supply Nets" [InNet('+5V')] p24: voltage=0.000
Width M4_BGA_Width [InComponent('M18')] p1: maxlimit=6 minlimit=2 preferedwidth=4 checkconnectedcopper=TRUE
Width [All] p2: maxlimit=8 minlimit=2 preferedwidth=6
25 further rules are at their usual default settings.

## Classes and differential pairs
net class ULPI_D[0..7]: PA3 PB0 PB1 PB5 PB10 PB11 PB12 PB13
net class PK[0..7]: LCD_B4 LCD_B5 LCD_B6 LCD_B7 LCD_G5 LCD_G6 LCD_G7 PK7
net class PJ[0..15]: LCD_B0 LCD_B1 LCD_B2 LCD_B3 LCD_G0 LCD_G1 LCD_G2 LCD_G3 LCD_G4 LCD_R1 LCD_R2 LCD_R3 LCD_R4 LCD_R5 LCD_R6 LCD_R7
net class PI[0..15]: D24 D25 D26 D27 D28 D29 D30 D31 LCD_R0 PI4 PI5 PI8 PI11 PI12 PI13 PI14
net class PH[0..15]: D16 D17 D18 D19 D20 D21 D22 D23 PH0 PH1 PH2 PH3 PH4 PH5 PH6 PH7
net class PG[0..15]: A10 A11 A12 A13 A14 A15 PG6 PG7 PG8 PG9 PG10 PG11 PG12 PG13 PG14 PG15
net class PF[0..15]: A0 A1 A2 A3 A4 A5 A6 A7 A8 A9 PF6 PF7 PF8 PF9 PF10 PF11
net class PE[0..15]: A19 A20 A21 A22 A23 D4 D5 D6 D7 D8 D9 D10 D11 D12 PE0 PE1
net class PD[0..15]: A16 A17 A18 D0 D1 D2 D3 D13 D14 D15 PD2 PD3 PD4 PD5 PD6 PD7
net class PC[0..15]: PC0 PC1 PC2 PC3 PC4 PC5 PC6 PC7 PC8 PC9 PC10 PC11 PC12 PC13 PC14 PC15
net class PB[0..15]: PB0 PB1 PB2 PB3 PB4 PB5 PB6 PB7 PB8 PB9 PB10 PB11 PB12 PB13 PB14 PB15
net class PA[0..15]: PA0 PA1 PA2 PA3 PA4 PA5 PA6 PA7 PA8 PA9 PA10 PA11 PA12 PA13 PA14 PA15
net class LCD_R[0..7]: LCD_R0 LCD_R1 LCD_R2 LCD_R3 LCD_R4 LCD_R5 LCD_R6 LCD_R7
net class LCD_G[0..7]: LCD_G0 LCD_G1 LCD_G2 LCD_G3 LCD_G4 LCD_G5 LCD_G6 LCD_G7
net class LCD_B[0..7]: LCD_B0 LCD_B1 LCD_B2 LCD_B3 LCD_B4 LCD_B5 LCD_B6 LCD_B7
net class D[0..31]: D0 D1 D2 D3 D4 D5 D6 D7 D8 D9 D10 D11 D12 D13 D14 D15 D16 D17 D18 D19 D20 D21 D22 D23 D24 D25 D26 D27 D28 D29 D30 D31
net class A[0..23]: A0 A1 A2 A3 A4 A5 A6 A7 A8 A9 A10 A11 A12 A13 A14 A15 A16 A17 A18 A19 A20 A21 A22 A23
differential pair USB_DEV_HS_CN: +USB_DEV_HS_CN_P -USB_DEV_HS_CN_N
differential pair USB_DEV_HS: +USB_DEV_HS_P -USB_DEV_HS_N
differential pair TD: +TD_P -TD_N
differential pair RD: +RD_P -RD_N

## Components (designator, comment, footprint, x,y, rotation, side; value= is the part's Value field where it differs from the comment)
B1 "1056" BAT_1056 1352,2163 r180 bottom
C1 "3.9pF" FP-CC0402-IPC_C 2942,2525 r270 top
C2 "3.9pF" FP-CC0402-IPC_C 2816.17,2185 r0 top
C3 "1.5pF" FP-CC0402-IPC_C 581,2378 r0 top
C4 "1.5pF" FP-CC0402-IPC_C 517,2403 r0 top
C5 "100nF" FP-CC0402-IPC_C 548.83,4403 r0 top
C6 "220uF" FP-CC0402-IPC_C 628.83,3618 r0 top
C7 "220pF" FP-CC0402-IPC_C 3135,2903 r180 top
C8 "47uF" FP-CC0402-IPC_C 1895,3018 r270 top value=470nF
C9 "10uF" FP-CC0402-IPC_C 2998,2525.17 r90 top value=10µF
C10 "10uF" FP-CC0402-IPC_C 1850,3017.83 r270 top value=10µF
C11 "100nF" FP-CC0402-IPC_C 1805,3017.83 r270 top
C12 "4.7uF" FP-CC0402-IPC_C 3142.83,3361 r180 top value=4.7µF
C13 "4.7uF" FP-CC0402-IPC_C 3143,3317 r180 top value=4.7µF
C14 "4.7uF" FP-CC0402-IPC_C 3144,3135 r180 top value=4.7µF
C15 "2.2uF" FP-CC0402-IPC_C 3143,3271 r180 top value=2.2µF
C16 "2.2uF" FP-CC0402-IPC_C 3143,3224 r180 top value=2.2µF
C17 "2.2uF" FP-CC0402-IPC_C 3143,3179 r180 top value=2.2µF
C18 "10uF" FP-CC0402-IPC_C 2949,2089.83 r90 top value=10µF
C19 "4.7uF" FP-CC0402-IPC_C 2633,2162 r0 top value=4.7µF
C20 "10uF" FP-CC0402-IPC_C 3724,2015 r270 top value=10µF
C21 "1uF" FP-CC0402-IPC_C 2838,2862 r0 top value=1µF
C22 "1uF" FP-CC0402-IPC_C 3108.83,2250 r0 top value=1µF
C23 "100nF" FP-CC0402-IPC_C 3109,2206 r0 top
C24 "1uF" FP-CC0402-IPC_C 3109,2117 r0 top value=1µF
C25 "100nF" FP-CC0402-IPC_C 3108.83,2162 r0 top
C26 "100nF" FP-CC0402-IPC_C 2828,3265.83 r90 top
C27 "100nF" FP-CC0402-IPC_C 2873,3265.83 r90 top
C28 "100nF" FP-CC0402-IPC_C 2784,3266 r90 top
C29 "100nF" FP-CC0402-IPC_C 2740,3265.83 r90 top
C30 "100nF" FP-CC0402-IPC_C 2695,3265.83 r90 top
C31 "100nF" FP-CC0402-IPC_C 2649,3265.83 r90 top
C32 "100nF" FP-CC0402-IPC_C 2604,3265.67 r90 top
C33 "100nF" FP-CC0402-IPC_C 2559,3265.83 r90 top
C34 "100nF" FP-CC0402-IPC_C 2918,3265.83 r90 top
C35 "100nF" FP-CC0402-IPC_C 2513,3265.83 r90 top
C36 "4.7uF" FP-CC0402-IPC_C 2963,3266 r270 top value=4.7µF
C37 "100nF" FP-CC0402-IPC_C 2547,3427 r90 top
C38 "100nF" FP-CC0402-IPC_C 2593,3427 r90 top
C39 "100nF" FP-CC0402-IPC_C 2638,3427 r90 top
C40 "100nF" FP-CC0402-IPC_C 2682,3427 r90 top
C41 "100nF" FP-CC0402-IPC_C 2729,3427 r90 top
C42 "100nF" FP-CC0402-IPC_C 2774,3427.17 r90 top
C43 "100nF" FP-CC0402-IPC_C 2863,3427 r90 top
C44 "100nF" FP-CC0402-IPC_C 2907,3427 r90 top
C45 "100nF" FP-CC0402-IPC_C 2819,3427 r90 top
C46 "100nF" FP-CC0402-IPC_C 2952,3427 r90 top
C47 "100nF" FP-CC0402-IPC_C 6410,4384 r180 top
C48 "100nF" FP-CC0402-IPC_C 658,365 r90 top
C49 "100nF" FP-CC0402-IPC_C 747,365.17 r90 top
C50 "100nF" FP-CC0402-IPC_C 4048,3167 r270 top
C51 "100nF" FP-CC0402-IPC_C 4093,3167 r270 top
C52 "100nF" FP-CC0402-IPC_C 299,365.17 r90 top
C53 "100nF" FP-CC0402-IPC_C 390,365.17 r90 top
C54 "100nF" FP-CC0402-IPC_C 435,365.17 r90 top
C55 "100nF" FP-CC0402-IPC_C 478,364.83 r90 top
C56 "100nF" FP-CC0402-IPC_C 3777,3167.17 r270 top
C57 "100nF" FP-CC0402-IPC_C 3822,3166.83 r270 top
C58 "100nF" FP-CC0402-IPC_C 3869,3166.83 r270 top
C59 "100nF" FP-CC0402-IPC_C 567,364.83 r90 top
C60 "100nF" FP-CC0402-IPC_C 611,365 r90 top
C61 "100nF" FP-CC0402-IPC_C 3915,3166.83 r270 top
C62 "100nF" FP-CC0402-IPC_C 522,365 r90 top
C63 "100nF" FP-CC0402-IPC_C 343,365.17 r90 top
C64 "100nF" FP-CC0402-IPC_C 3959,3166.83 r270 top
C65 "100nF" FP-CC0402-IPC_C 4004,3166.83 r270 top
C66 "100nF" FP-CC0402-IPC_C 703,365 r90 top
C67 "100nF" FP-CC0402-IPC_C 4402.5,3748 r180 top
C68 "4.7uF" FP-CC0402-IPC_C 4402.67,3837 r180 top value=4.7µF
C69 "100nF" FP-CC0402-IPC_C 4402.83,3792 r180 top
C70 "1uF" FP-CC0402-IPC_C 4140,3167.17 r90 top value=1µF
C71 "100nF" FP-CC0402-IPC_C 4988,3964 r270 top
C72 "4.7uF" FP-CC0402-IPC_C 5023,3964 r270 top value=4.7µF
C73 "100nF" FP-CC0402-IPC_C 5068,3964 r270 top
C74 "4.7uF" FP-CC0402-IPC_C 4872,4179 r90 top value=4.7µF
C75 "1uF" FP-CC0402-IPC_C 5113,3964 r270 top value=1µF
C76 "1uF" FP-CC0402-IPC_C 4418,4344 r180 top value=1µF
C77 "4.7uF" FP-CC0402-IPC_C 4917,4073 r90 top value=4.7µF
C78 "4.7uF" FP-CC0402-IPC_C 5159,3964 r270 top value=4.7µF
C79 "4.7uF" FP-CC0402-IPC_C 5204,3964.17 r270 top value=4.7µF
C80 "100nF" FP-CC0402-IPC_C 4780,3747.17 r270 top
C81 "100nF" FP-CC0402-IPC_C 4463.67,3822 r90 top
C82 "1uF" FP-CC0402-IPC_C 5027,4057 r270 top value=1µF
C83 "4.7uF" FP-CC0402-IPC_C 4411,4051 r180 top value=4.7µF
C84 "4.7uF" FP-CC0402-IPC_C 4552,4297.83 r90 top value=4.7µF
C85 "100nF" FP-CC0402-IPC_C 1302,3383 r270 top
C86 "2.2uF" FP-CC0402-IPC_C 4786.83,3692 r0 top value=2.2µF
C87 "2.2uF" FP-CC0402-IPC_C 4541,4420 r90 top value=2.2µF
C88 "2.2uF" FP-CC0402-IPC_C 4443.67,3882 r180 top value=2.2µF
C89 "100nF" FP-CC0402-IPC_C 1347,3383 r270 top
C90 "10uF" FP-CC0402-IPC_C 5458.49,3510.02 r0 top value=10µF
C91 "100nF" FP-CC0402-IPC_C 5458.49,3466.02 r180 top
C92 "100nF" FP-CC0402-IPC_C 2721,4605 r0 top
C93 "100nF" FP-CC0402-IPC_C 2717,4503 r270 top
C94 "470pF" FP-CC0402-IPC_C 3612,4872.83 r90 top
C95 "1uF" FP-CC0402-IPC_C 3656,4873.17 r90 top value=1µF
C96 "100nF" FP-CC0402-IPC_C 3731,4661 r0 top
C97 "100nF" FP-CC0402-IPC_C 3747,4873 r90 top
C98 "100nF" FP-CC0402-IPC_C 3702,4873.17 r90 top
C99 "10uF" FP-CC0402-IPC_C 3882,4873 r90 top value=10µF
C100 "100nF" FP-CC0402-IPC_C 3792,4872.83 r90 top
C101 "100nF" FP-CC0402-IPC_C 3837,4873 r90 top
C102 "30pF" FP-CC0402-IPC_C 3184,4647.17 r270 top
C103 "30pF" FP-CC0402-IPC_C 3123,4648 r270 top
C104 "4.7uF" FP-CC0402-IPC_C 1155.83,524 r0 top value=4.7µF
C105 "100nF" FP-CC0402-IPC_C 1435.83,490 r0 top
C106 "100nF" FP-CC0402-IPC_C 2457,839.17 r90 top
C107 "100nF" FP-CC0402-IPC_C 3390.83,1277 r0 top
C108 "100nF" FP-CC0402-IPC_C 3344,1184.17 r270 top
C109 "100nF" FP-CC0402-IPC_C 3260,1186 r270 top
C110 "100nF" FP-CC0402-IPC_C 1531,992 r0 top
C111 "100nF" FP-CC0402-IPC_C 1307,608 r270 top
C112 "2.2uF" FP-CC0402-IPC_C 1371,607.83 r270 top value=2.2µF
C113 "33pF" FP-CC0402-IPC_C 1819,834.83 r90 top
C114 "33pF" FP-CC0402-IPC_C 1822.83,717 r0 top
C115 "100nF" FP-CC0402-IPC_C 1813,950 r0 top
C116 "4.7uF" FP-CC0402-IPC_C 393,959 r90 top value=4.7µF
C117 "100nF" FP-CC0402-IPC_C 1072.17,4637 r180 top
C118 "100nF" FP-CC0402-IPC_C 1141,4549 r0 top
C119 "100nF" FP-CC0402-IPC_C 1141.17,4594 r0 top
C120 "100nF" FP-CC0402-IPC_C 700.17,4583 r0 top
C121 "100nF" FP-CC0402-IPC_C 700,4539 r180 top
C122 "100nF" FP-CC0402-IPC_C 1072,1618 r0 top
C123 "100nF" FP-CC0402-IPC_C 1803.17,1605 r0 top
C124 "1uF" FP-CC0402-IPC_C 4533,3605 r0 top value=1µF
C125 "100nF" FP-CC0402-IPC_C 4192,3518 r180 top
C126 "100nF" FP-CC0402-IPC_C 4123,3473 r0 top
C127 "100nF" FP-CC0402-IPC_C 4123,3518 r0 top
C128 "100nF" FP-CC0402-IPC_C 3817,615 r90 top
C129 "100nF" FP-CC0402-IPC_C 4214,362 r180 top
C130 "100nF" FP-CC0402-IPC_C 1927,3616 r90 top
C131 "1uF" FP-CC0402-IPC_C 2236,3609 r270 top value=1µF
C132 "100nF" FP-CC0402-IPC_C 1502,3839 r180 top
C133 "2.2uF" FP-CC0402-IPC_C 2396,3863 r180 top value=2.2µF
C134 "1uF" FP-CC0402-IPC_C 4528,465 r270 top value=1µF
C135 "100nF" FP-CC0402-IPC_C 4480,465.17 r270 top
C136 "10uF" FP-CC0402-IPC_C 4591,762 r270 top value=10µF
C137 "1uF" FP-CC0402-IPC_C 4686,762 r270 top value=1µF
C138 "100nF" FP-CC0402-IPC_C 4638,762 r270 top
C139 "100nF" FP-CC0402-IPC_C 1369,3978 r270 top
C140 "100nF" FP-CC0402-IPC_C 1413,4057 r90 top
C141 "100nF" FP-CC0402-IPC_C 1413,3978.83 r270 top
C142 "100nF" FP-CC0402-IPC_C 1460,4015 r270 top
C143 "100nF" FP-CC0402-IPC_C 1234,3977.83 r270 top
C144 "100nF" FP-CC0402-IPC_C 1279,3977.83 r270 top
C145 "100nF" FP-CC0402-IPC_C 1324,3977.83 r270 top
C146 "100nF" FP-CC0402-IPC_C 1368,4057 r90 top
C147 "100nF" FP-CC0402-IPC_C 1187,3978.17 r270 top
C148 "100nF" FP-CC0402-IPC_C 1143,3978 r270 top
C149 "100nF" FP-CC0402-IPC_C 1323,4056.83 r90 top
C150 "100nF" FP-CC0402-IPC_C 1278,4057 r90 top
C151 "2.2uF" FP-CC0402-IPC_C 1379,3613 r270 top value=2.2µF
C152 "2.2uF" FP-CC0402-IPC_C 2395,4032 r0 top value=2.2µF
C153 "4.7uF" FP-CC0402-IPC_C 1233,4057.17 r90 top value=4.7µF
C154 "1uF" FP-CC0402-IPC_C 1188,4057.17 r90 top value=1µF
C155 "100nF" FP-CC0402-IPC_C 1143,4057 r270 top
C156 "100nF" FP-CC0402-IPC_C 4308.17,782 r180 top
C157 "100nF" FP-CC0402-IPC_C 4308.17,734 r180 top
C158 "100nF" FP-CC0402-IPC_C 4308,688 r180 top
C159 "100nF" FP-CC0402-IPC_C 4237,698 r90 top
C160 "100nF" FP-CC0402-IPC_C 4378,772.17 r270 top
C161 "1uF" FP-CC0402-IPC_C 3814,1059 r90 top value=1µF
C162 "100nF" FP-CC0402-IPC_C 3922,1006 r90 top
C163 "100nF" FP-CC0402-IPC_C 6444,2304 r0 top
C164 "100nF" FP-CC0402-IPC_C 6446,2494 r90 top
C165 "100nF" FP-CC0402-IPC_C 6443.83,2395 r0 top
C166 "100nF" FP-CC0402-IPC_C 6334.83,2090 r180 top
C167 "100nF" FP-CC0402-IPC_C 6445,2582 r180 top
C168 "4.7uF" FP-CC0402-IPC_C 6442,2047 r180 top value=4.7µF
C169 "100nF" FP-CC0402-IPC_C 6354,4557 r270 top
C170 "100nF" FP-CC0402-IPC_C 2254,3509 r0 top
C171 "100nF" FP-CC0402-IPC_C 2053,3175.83 r90 top
C172 "100nF" FP-CC0402-IPC_C 1413,4182.17 r90 top
CN1 "DC-POWER" FP-PJ-102A-MFG 261.31,3326 r90 top
CN2 "FTR-120-03-L-D-LC" SAMTEC_FTR-120-03-L-D-LC 3414,3781.5 r0 top
CN3 "FTR-120-03-L-D-LC" SAMTEC_FTR-120-03-L-D-LC 3393,1707.5 r180 top
D1 "BAT60JFILM" FP-BAT60JFILM-MFG 3534,3202 r90 top
D2 "ESDALC6V1-1U2" DIODE_ESDALC6V1-1U2 3084,2786 r270 top value=12pF
D3 "BAT60JFILM" FP-BAT60JFILM-MFG 1566,4234 r180 top
D4 "BAT60JFILM" FP-BAT60JFILM-MFG 544,4487 r0 top
D5 "ESDA6V1BC6" FP-SOT23-6L-MFG 5163,4096 r0 top value=20pF
D6 "ESDA6V1BC6" FP-SOT23-6L-MFG 5663,533 r90 top value=20pF
D7 "ESDA7P60-1U1M" FP-1610-MFG 540,1253 r270 top
D8 "VLMS1500-GS08" LEDRED 2844,1394 r180 top
D9 "VLMS1500-GS08" LEDRED 737,560 r180 top
D10 "ESDA7P60-1U1M" FP-1610-MFG 446,956 r90 top
D11 "ESDA7P60-1U1M" FP-1610-MFG 4032,608 r0 top
D12 "ESDA7P60-1U1M" FP-1610-MFG 2051,841 r0 top
D13 "VLMS1500-GS08" LEDRED 2437,3595 r270 top
D14 "BAT60JFILM" FP-BAT60JFILM-MFG 1737,3590 r0 top
D15 "VLMS1500-GS08" LEDRED 2466,4043 r90 top
D16 "BAT60JFILM" FP-BAT60JFILM-MFG 4816,616 r0 top
D17 "BAT60JFILM" FP-BAT60JFILM-MFG 4815,552 r180 top
D18 "BAT60JFILM" FP-BAT60JFILM-MFG 4814,488 r180 top
D19 "BAT60JFILM" FP-BAT60JFILM-MFG 4814,424 r180 top
D20 "BAT60JFILM" FP-BAT60JFILM-MFG 4813,360 r180 top
D21 "BAT60JFILM" FP-BAT60JFILM-MFG 4813,296 r180 top
D22 "ESDA7P60-1U1M" FP-1610-MFG 539,1917 r270 top
D23 "ESDAULC6-1U2" DIODE_ESDALC6V1-1U2 5046,676 r270 top value=800fF
D24 "ESDAULC6-1U2" DIODE_ESDALC6V1-1U2 4985,679 r270 top value=800fF
D25 "ESDAULC6-1U2" DIODE_ESDALC6V1-1U2 718,1691 r90 top value=800fF
D26 "ESDAULC6-1U2" DIODE_ESDALC6V1-1U2 771,1691 r90 top value=800fF
D27 "ESDAULC6-1U2" DIODE_ESDALC6V1-1U2 2810.3,4600 r180 top value=800fF
D28 "ESDAULC6-1U2" DIODE_ESDALC6V1-1U2 2810.3,4554 r180 top value=800fF
D29 "ESDAULC6-1U2" DIODE_ESDALC6V1-1U2 2810.3,4507 r180 top value=800fF
D30 "ESDAULC6-1U2" DIODE_ESDALC6V1-1U2 2809.3,4453 r180 top value=800fF
D31 "ESDAULC6-1U2" DIODE_ESDALC6V1-1U2 2809.3,4399 r180 top value=800fF
D32 "ESDAULC6-1U2" DIODE_ESDALC6V1-1U2 2744,4361 r270 top value=800fF
D33 "ESDAULC6-1U2" DIODE_ESDALC6V1-1U2 3971,4203 r0 top value=800fF
D34 "ESDAULC6-1U2" DIODE_ESDALC6V1-1U2 2811.3,4302 r180 top value=800fF
D35 "ESDAULC6-1U2" DIODE_ESDALC6V1-1U2 2810,4152 r180 top value=800fF
D36 "ESDAULC6-1U2" DIODE_ESDALC6V1-1U2 2810.3,4206 r180 top value=800fF
D37 "ESDAULC6-1U2" DIODE_ESDALC6V1-1U2 2810,4254 r180 top value=800fF
D38 "ESDAULC6-1U2" DIODE_ESDALC6V1-1U2 2809.3,4351 r180 top value=800fF
D39 "BAT60JFILM" FP-BAT60JFILM-MFG 3852,1253 r90 top
F1 "FUSE" FP-0ZCJ0010FF2E-MFG 542,4297 r0 top value=1.6Ω
J1 "61300311121" 61300311121 582,1614 r90 top
J2 "61300311121" 61300311121 896,1621 r90 top
J3 "HEADER" JST_B2B-XH-A 4188,2987 r0 top
J4 "HEADER" JST_B2B-XH-A 3339.79,3221.33 r180 top
J5 "HEADER" JST_B2B-XH-A 1310.21,4397.67 r0 top
J6 "H2X6" MLE_TSHC-106-D-06-240-F-LF 4242,2353 r90 top
J7 "LD1117S18TR" SOT230P700X180-4N 1868,3351 r0 top
J8 "HEADER" JST_B2B-XH-A 1614.33,3060.21 r90 top
J9 "ST1L05BPUR" SON95P300X300X100-7N 2754,2047 r0 top
J10 "LM1084ISX-3.3/NOPB" TO254P1524X483-4N 4579,1686 r0 top
J11 "61300311121" 61300311121 2004,2259 r90 top
J12 "HEADER" JST_B2B-XH-A 6237,3110 r90 top
J13 "SJ2-35984B-SMT-TR" NEUTRIK_NRJ6HF 6491,1401 r0 top
J14 "SJ2-35984B-SMT-TR" NEUTRIK_NRJ6HF 6491,610 r0 top
J15 "MP34DT05TR-A" FP-HCLGA-DM00231908-MFG 1204.73,3381.43 r0 top value=100pF
J16 "MP34DT05TR-A" FP-HCLGA-DM00231908-MFG 969,4018 r0 top value=100pF
J17 "61300311121" 61300311121 4239,4107 r270 top
J18 "PPPC061LGBN-RC" PPPC061LGBN-RC 1386,2852 r180 top
J19 "PPPC061LGBN-RC" PPPC061LGBN-RC 706,2860 r0 top
J20 "SSM-104-L-DH" SAMTEC_SSM-104-X-DH 5191,1316 r90 top
J21 "USBLC6-4SC6" SOT23-6L_STM 3000,4734 r0 top value=3pF
J22 "61300311121" 61300311121 1898,5204 r90 top
J23 "USBLC6-4SC6" SOT23-6L_STM 687,1318 r270 top value=3pF
J24 "USBLC6-4SC6" SOT23-6L_STM 628,733 r180 top value=3pF
J25 "HEADER" JST_B2B-XH-A 3429.21,2156.67 r0 top
J26 "*FTSH-107-01-L-DV" CON14_2X7_DU_FTSH_SAI 5145,865 r0 top
J27 "FTSH-110-01-L-DV" SMTC-FTSH-110-01-L-DV_V 3103,4364 r90 top
J28 "FTSH-110-01-L-DV" SMTC-FTSH-110-01-L-DV_V 3783,4378 r90 top
J29 "HEADER" JST_B2B-XH-A 3466,5212 r90 top
L1 "BNX002-11" FIL_BNX002-11 600.43,5190.57 r0 top
L2 "FBMJ1608HM180NTR" BEADC1608X100N 2994,2777 r0 top value=4mΩ
L3 "FBMJ1608HM180NTR" BEADC1608X100N 5451.49,3567.02 r0 top value=4mΩ
L4 "FBMJ1608HM180NTR" BEADC1608X100N 5451.49,3627.02 r0 top value=4mΩ
L5 "FBMJ1608HM180NTR" BEADC1608X100N 2999,4945 r0 top value=4mΩ
L6 "FBMJ1608HM180NTR" BEADC1608X100N 560,2487 r180 top value=4mΩ
L7 "FBMJ1608HM180NTR" BEADC1608X100N 3279,1277 r0 top value=4mΩ
L8 "FBMJ1608HM180NTR" BEADC1608X100N 3711,1168 r0 top value=4mΩ
LD1 "GREEN" LEDGREEN 4071,2081 r90 top
LD2 "GREEN" LEDGREEN 1873,576 r180 top
LD3 "GREEN" LEDGREEN 2996,1450 r180 top
LD4 "GREEN" LEDGREEN 1010,456 r180 top
LD5 "GREEN" LEDGREEN 4262,194 r180 top
LD6 "GREEN" LEDGREEN 4261,233 r180 top
LD7 "GREEN" LEDGREEN 4259,309 r0 top
LD8 "GREEN" LEDGREEN 4261,271 r180 top
LD9 "GREEN" LEDGREEN 2389,4123 r270 top
M1 "IS42S32800G-6BLI" FP-TFBGA240+25-A07U-MFG 5815.49,2514.52 r0 top
M2 "IS61WV102416BLL-10MLI" ISSI-TF-BGA-48-9000X11000DE 5778.18,3278.76 r0 top
M3 "MT28EW128ABA1LPC-0SIT TR" LBGA64_11X13_PC_MRN-M 5877.69,3874.2 r0 top
M4 "WM8994ECS/R" W-CSP-72_4P521X4P033X0P546_CIR 4715,3951.84 r0 top
M5 "87832-5020" CONN50_878325020_MOL 5101.65,2821.96 r90 top
M6 "LAN8742A-CZ-TR" FP-C04-143B-S4QFN-IPC_C 3437,4785 r0 top
M7 "J0011D21BNL" PULS-J00XXD21XNL-B-12 1350.91,5122.02 r90 top
M8 "USB-AB" CONN_1050170001_MOL 350,1426 r270 top
M9 "STMPS2151STR" FP-SOT23-5L-7049676-MFG 1312,492 r0 top value=90mΩ
M10 "USB3320C-EZK" QFN32_5X5MC_MCH 1329,861 r270 top
M11 "USB-AB" CONN_1050170001_MOL 355,2662 r270 top
M12 "STMPS2151STR" FP-SOT23-5L-7049676-MFG 610,879 r90 top value=90mΩ
M13 "USB-AB" CONN_1050170001_MOL 352,662 r270 top
M14 "ST3241EBPR" SSOP28_STM-L 917,4428 r0 top
M15 "173109-0181" CONN_F09S5Y-1002_MOL 2367.95,5472 r0 top locked
M16 "MT25QL512ABB8ESF-0SIT" SOIC127P1032X265-16N 1361,1502 r0 top
M17 "MT25QL512ABB8ESF-0SIT (2)" SOIC127P1032X265-16N 2084,1503 r0 top
M18 "IP4856CX25/CZ" WLCSP25_NEX 4356.5,3617 r0 top
M19 "1939870-1" TE_1939870-1 5646,5204 r180 top
M20 "09032" XDCR_COM-09032 3197.5,550 r90 top
M21 "STMPS2151STR" FP-SOT23-5L-7049676-MFG 2550,3886 r0 top value=90mΩ
M22 "LD3985M33R" SOT95P280X145-5N 4636,659 r180 top
M23 "105017-0001 (2)" CONN_1050170001_MOL 351.7,1998.37 r270 top
M24 "ECMF02-2AMX6" FP-QFN-6L-MFG 643,2022 r180 top
M25 "STM32L152CCT6" QFP50P900X900X160-48N 4181.17,1021.53 r0 top
M26 "687140149022" 687140149022 6694,2369 r90 top
M27 "FTSH-125-01-F-DV-K" SAMTEC_FTSH-125-01-X-DV-K 6617,3851 r90 top
M28 "505110-0892" FP-505110-0892-MFG 6612,4707 r90 top
M29 "FTR-130-03-L-D-LC" SAMTEC_FTR-130-03-L-D-LC 2256,2729 r90 top
M30 "FTR-130-03-L-D-LC" SAMTEC_FTR-130-03-L-D-LC 4669.5,2756 r90 top
M31 "MCP2562FDT-H/SN" FP-C04-057-SN-MFG 2669,2532 r0 top
M32 "173109-0181" CONN_F09S5Y-1002_MOL 4193.94,5467 r0 top
R1 "1.5K" RESC1608X55X25NL10T15 2290,4408 r0 top value=1.5kΩ
R2 "1.5K" RESC1608X55X25NL10T15 2151,4406 r180 top value=1.5kΩ
R3 "10K" RESC1608X55X25NL10T15 1870.56,4402 r180 top value=10kΩ
R4 "10K" RESC1608X55X25NL10T15 2011,4403 r180 top value=10kΩ
R5 "10K" RESC1608X55X25NL10T15 1709.56,4400 r0 top value=10kΩ
R6 "33R" RESC1608X55X25NL10T15 5821,1697.44 r90 top value=33Ω
R7 "33R" RESC1608X55X25NL10T15 3312,2330 r0 top value=33Ω
R8 "33R" RESC1608X55X25NL10T15 2968,1926 r270 top value=33Ω
R9 "33R" RESC1608X55X25NL10T15 5606,1703.44 r90 top value=33Ω
R10 "33R" RESC1608X55X25NL10T15 3436,2319 r180 top value=33Ω
R11 "33R" RESC1608X55X25NL10T15 3028,1926 r270 top value=33Ω
R12 "33R" RESC1608X55X25NL10T15 3587,3557 r270 top value=33Ω
R13 "33R" RESC1608X55X25NL10T15 3089,1926 r270 top value=33Ω
R14 "33R" RESC1608X55X25NL10T15 3728,4018 r90 top value=33Ω
R15 "33R" RESC1608X55X25NL10T15 3115,1487 r90 top value=33Ω
R16 "33R" RESC1608X55X25NL10T15 3574,4018 r90 top value=33Ω
R17 "33R" RESC1608X55X25NL10T15 3440,3560 r270 top value=33Ω
R18 "33R" RESC1608X55X25NL10T15 2468,3393 r90 top value=33Ω
R19 "33R" RESC1608X55X25NL10T15 3369,1490 r90 top value=33Ω
R20 "33R" RESC1608X55X25NL10T15 3465,1490 r90 top value=33Ω
R21 "33R" RESC1608X55X25NL10T15 4269,3509 r90 top value=33Ω
R22 "33R" RESC1608X55X25NL10T15 3874,4018 r90 top value=33Ω
R23 "10K" RESC1608X55X25NL10T15 3661,3159 r270 top value=10kΩ
R24 "33R" RESC1608X55X25NL10T15 4346,4596 r180 top value=33Ω
R25 "33R" RESC1608X55X25NL10T15 2035,2767 r180 top value=33Ω
R26 "33R" RESC1608X55X25NL10T15 3417,1490 r90 top value=33Ω
R27 "33R" RESC1608X55X25NL10T15 4512,4596 r180 top value=33Ω
R28 "33R" RESC1608X55X25NL10T15 3357,1925 r270 top value=33Ω
R29 "33R" RESC1608X55X25NL10T15 2234,4508 r0 top value=33Ω
R30 "33R" RESC1608X55X25NL10T15 3076,3583 r270 top value=33Ω
R31 "33R" RESC1608X55X25NL10T15 3342,3566 r90 top value=33Ω
R32 "33R" RESC1608X55X25NL10T15 4449,2620 r180 top value=33Ω
R33 "33R" RESC1608X55X25NL10T15 3949,2146 r90 top value=33Ω
R34 "220K" RESC1608X55X25NL10T15 5500,1708.44 r90 top value=220kΩ
R35 "33R" RESC1608X55X25NL10T15 4888,2628 r0 top value=33Ω
R36 "33R" RESC1608X55X25NL10T15 3837,2278 r90 top value=33Ω
R37 "220K" RESC1608X55X25NL10T15 2025,4796 r90 top value=220kΩ
R38 "33R" RESC1608X55X25NL10T15 2475,2292 r0 top value=33Ω
R39 "33R" RESC1608X55X25NL10T15 4887,2132 r180 top value=33Ω
R40 "33R" RESC1608X55X25NL10T15 3746,2274 r90 top value=33Ω
R41 "33R" RESC1608X55X25NL10T15 3419,1925 r90 top value=33Ω
R42 "33R" RESC1608X55X25NL10T15 3141,2954 r180 top value=33Ω
R43 "33R" RESC1608X55X25NL10T15 2475,2390 r0 top value=33Ω
R44 "33R" RESC1608X55X25NL10T15 2475,2341 r0 top value=33Ω
R45 "33R" RESC1608X55X25NL10T15 1058,1813.56 r90 top value=33Ω
R46 "33R" RESC1608X55X25NL10T15 5272,3903 r180 top value=33Ω
R47 "33R" RESC1608X55X25NL10T15 2927,4018 r90 top value=33Ω
R48 "33R" RESC1608X55X25NL10T15 2860,2515 r90 top value=33Ω
R49 "33R" RESC1608X55X25NL10T15 3620,1926.56 r270 top value=33Ω
R50 "33R" RESC1608X55X25NL10T15 3424,4018 r90 top value=33Ω
R51 "33R" RESC1608X55X25NL10T15 6028,1794.44 r90 top value=33Ω
R52 "33R" RESC1608X55X25NL10T15 3524,4018 r90 top value=33Ω
R53 "33R" RESC1608X55X25NL10T15 5620,1846.44 r90 top value=33Ω
R54 "33R" RESC1608X55X25NL10T15 3475,4018 r90 top value=33Ω
R55 "33R" RESC1608X55X25NL10T15 5730,1848.44 r90 top value=33Ω
R56 "33R" RESC1608X55X25NL10T15 3858,1500 r180 top value=33Ω
R57 "33R" RESC1608X55X25NL10T15 3490,3560 r270 top value=33Ω
R58 "33R" RESC1608X55X25NL10T15 5820,1851.44 r90 top value=33Ω
R59 "33R" RESC1608X55X25NL10T15 3678,4018 r90 top value=33Ω
R60 "33R" RESC1608X55X25NL10T15 5917,1703.44 r90 top value=33Ω
R61 "33R" RESC1608X55X25NL10T15 2919,1927 r90 top value=33Ω
R62 "33R" RESC1608X55X25NL10T15 3209,3571 r90 top value=33Ω
R63 "33R" RESC1608X55X25NL10T15 3772,1925 r270 top value=33Ω
R64 "33R" RESC1608X55X25NL10T15 2841,1707 r180 top value=33Ω
R65 "33R" RESC1608X55X25NL10T15 3626,2225 r90 top value=33Ω
R66 "33R" RESC1608X55X25NL10T15 3846,2146 r90 top value=33Ω
R67 "220K" RESC1608X55X25NL10T15 3722,1926 r90 top value=220kΩ
R68 "33R" RESC1608X55X25NL10T15 3043,1498 r0 top value=33Ω
R69 "33R" RESC1608X55X25NL10T15 2066.44,4500 r0 top value=33Ω
R70 "220K" RESC1608X55X25NL10T15 3859,1453 r0 top value=220kΩ
R71 "33R" RESC1608X55X25NL10T15 672,4123.44 r90 top value=33Ω
R72 "220K" RESC1608X55X25NL10T15 3671,1926 r90 top value=220kΩ
R73 "33R" RESC1608X55X25NL10T15 5497,1848.44 r90 top value=33Ω
R74 "33R" RESC1608X55X25NL10T15 6258.49,2145.46 r90 top value=33Ω
R75 "33R" RESC1608X55X25NL10T15 5714,1698.44 r90 top value=33Ω
R76 "33R" RESC1608X55X25NL10T15 5918,1857 r90 top value=33Ω
R77 "33R" RESC1608X55X25NL10T15 5344,3157.56 r90 top value=33Ω
R78 "0R" RESC1608X55X25NL10T15 2807,2309 r0 top value=0Ω
R79 "33R" RESC1608X55X25NL10T15 4672,4588 r0 top value=33Ω
R80 "33R" RESC1608X55X25NL10T15 1787,1811.44 r90 top value=33Ω
R81 "33R" RESC1608X55X25NL10T15 3204,2130 r90 top value=33Ω
R82 "0R" RESC1608X55X25NL10T15 2907,2261 r90 top value=0Ω
R83 "33R" RESC1608X55X25NL10T15 2528,1804 r90 top value=33Ω
R84 "33R" RESC1608X55X25NL10T15 2473,2653 r90 top value=33Ω
R85 "33R" RESC1608X55X25NL10T15 4382,2943 r90 top value=33Ω
R86 "33R" RESC1608X55X25NL10T15 4441,2944 r90 top value=33Ω
R87 "33R" RESC1608X55X25NL10T15 4026,2282 r90 top value=33Ω
R88 "0R" RESC1608X55X25NL10T15 3143,3003 r0 top value=0Ω
R89 "33R" RESC1608X55X25NL10T15 3930,2277 r90 top value=33Ω
R90 "10K" RESC1608X55X25NL10T15 3220,3162 r90 top value=10kΩ
R91 "0R" RESC1608X55X25NL10T15 3144,3052 r0 top value=0Ω
R92 "33R" RESC1608X55X25NL10T15 3746,2146 r90 top value=33Ω
R93 "10K" RESC1608X55X25NL10T15 4452,3171 r180 top value=10kΩ
R94 "820R" RESC1608X55X25NL10T15 4114,2082 r90 top value=820Ω
R95 "22K" RESC1608X55X25NL10T15 2893,2099 r270 top value=22kΩ
R96 "1K" RESC1608X55X25NL10T15 2721,2227 r270 top value=1kΩ
R97 "16K" RESC1608X55X25NL10T15 2990,2100 r270 top value=16kΩ
R98 "0R" RESC1608X55X25NL10T15 2966,2659 r90 top value=0Ω
R99 "0R" RESC1608X55X25NL10T15 3059,2655 r90 top value=0Ω
R100 "0R" RESC1608X55X25NL10T15 5431.49,3191.02 r0 top value=0Ω
R101 "10K" RESC1608X55X25NL10T15 5435.49,3831.02 r90 top value=10kΩ
R102 "0R" RESC1608X55X25NL10T15 5435.49,3731.02 r90 top value=0Ω
R103 "10K" RESC1608X55X25NL10T15 5426.49,3296.02 r90 top value=10kΩ
R104 "0R" RESC1608X55X25NL10T15 5376.49,3296.02 r90 top value=0Ω
R105 "0R" RESC1608X55X25NL10T15 5510.49,3678.02 r0 top value=0Ω
R106 "10K" RESC1608X55X25NL10T15 6296,4311 r270 top value=10kΩ
R107 "10K" RESC1608X55X25NL10T15 3712,3159 r270 top value=10kΩ
R108 "10K" RESC1608X55X25NL10T15 6320,4384 r0 top value=10kΩ
R109 "10K" RESC1608X55X25NL10T15 6221,3456 r0 top value=10kΩ
R110 "0R" RESC1608X55X25NL10T15 4716,3732 r270 top value=0Ω
R111 "4K7" RESC1608X55X25NL10T15 4469.67,3732 r90 top value=4.7kΩ
R112 "0R" RESC1608X55X25NL10T15 4578.67,3776 r90 top value=0Ω
R113 "2K2" RESC1608X55X25NL10T15 4972,4065 r270 top value=2.2kΩ
R114 "1K" RESC1608X55X25NL10T15 4781,4358 r90 top value=1kΩ
R115 "20R" RESC1608X55X25NL10T15 4859,3744 r180 top value=20Ω
R116 "20R" RESC1608X55X25NL10T15 4523.67,3776 r90 top value=20Ω
R117 "180R" RESC1608X55X25NL10T15 4732,4358 r90 top value=180Ω
R118 "0R" RESC1608X55X25NL10T15 4618,247 r90 top value=0Ω
R119 "180R" RESC1608X55X25NL10T15 5891,669 r270 top value=180Ω
R120 "1K" RESC1608X55X25NL10T15 4654,4361 r90 top value=1kΩ
R121 "10K" RESC1608X55X25NL10T15 1387,3373 r270 top value=10kΩ
R122 "0R" RESC1608X55X25NL10T15 5661,343 r0 top value=0Ω
R123 "10K" RESC1608X55X25NL10T15 1436,3373 r270 top value=10kΩ
R124 "0R" RESC1608X55X25NL10T15 5622,1444 r180 top value=0Ω
R125 "0R" RESC1608X55X25NL10T15 3069,2505 r90 top value=0Ω
R126 "0R" RESC1608X55X25NL10T15 5620,1352 r0 top value=0Ω
R127 "10K" RESC1608X55X25NL10T15 3429,4355 r180 top value=10kΩ
R128 "10K" RESC1608X55X25NL10T15 3429,4206 r0 top value=10kΩ
R129 "10K" RESC1608X55X25NL10T15 3429,4405 r0 top value=10kΩ
R130 "50R" RESC1608X55X25NL10T15 3457,4962 r90 top value=50Ω
R131 "50R" RESC1608X55X25NL10T15 3406,4962 r90 top value=50Ω
R132 "50R" RESC1608X55X25NL10T15 3557,4963 r90 top value=50Ω
R133 "50R" RESC1608X55X25NL10T15 3505,4966 r90 top value=50Ω
R134 "33R" RESC1608X55X25NL10T15 3429,4306 r180 top value=33Ω
R135 "33R" RESC1608X55X25NL10T15 3429,4256 r180 top value=33Ω
R136 "10K" RESC1608X55X25NL10T15 3161,4965 r270 top value=10kΩ
R137 "12K1" RESC1608X55X25NL10T15 3354,4963 r90 top value=12.1kΩ
R138 "33R" RESC1608X55X25NL10T15 3429,4455 r180 top value=33Ω
R139 "1.5K" RESC1608X55X25NL10T15 3666,4687 r90 top value=1.5kΩ
R140 "0R" RESC1608X55X25NL10T15 3741,4713 r180 top value=0Ω
R141 "33R" RESC1608X55X25NL10T15 3429,4504 r180 top value=33Ω
R142 "270R" RESC1608X55X25NL10T15 3938,4863.44 r90 top value=270Ω
R143 "10K" RESC1608X55X25NL10T15 3266,4821 r180 top value=10kΩ
R144 "270R" RESC1608X55X25NL10T15 4012.56,4889 r180 top value=270Ω
R145 "10K" RESC1608X55X25NL10T15 3429,4554 r0 top value=10kΩ
R146 "0R" RESC1608X55X25NL10T15 3293,4771 r0 top value=0Ω
R147 "330R" RESC1608X55X25NL10T15 2168,1136 r180 top value=330Ω
R148 "47K" RESC1608X55X25NL10T15 598,1239 r270 top value=47kΩ
R149 "22K" RESC1608X55X25NL10T15 571,1165 r180 top value=22kΩ
R150 "10K" RESC1608X55X25NL10T15 4433,1014 r0 top value=10kΩ
R151 "0R" RESC1608X55X25NL10T15 2945,1341 r0 top value=0Ω
R152 "3K3" RESC1608X55X25NL10T15 2923,1416 r90 top value=3.3kΩ
R153 "620R" RESC1608X55X25NL10T15 2850,1436 r0 top value=620Ω
R154 "330R" RESC1608X55X25NL10T15 2944,1492 r180 top value=330Ω
R155 "47K" RESC1608X55X25NL10T15 3415,1163 r90 top value=47kΩ
R156 "0R" RESC1608X55X25NL10T15 1542,1106 r270 top value=0Ω
R157 "0R" RESC1608X55X25NL10T15 1565,924 r180 top value=0Ω
R158 "0R" RESC1608X55X25NL10T15 1569,849 r180 top value=0Ω
R159 "8K06" RESC1608X55X25NL10T15 1492,583 r270 top value=8.06kΩ
R160 "22K" RESC1608X55X25NL10T15 3483,1163 r270 top value=22kΩ
R161 "0R" RESC1608X55X25NL10T15 1719,1186 r270 top value=0Ω
R162 "820R" RESC1608X55X25NL10T15 1438,582 r90 top value=820Ω
R163 "0R" RESC1608X55X25NL10T15 994,676 r0 top value=0Ω
R164 "0R" RESC1608X55X25NL10T15 993,822 r0 top value=0Ω
R165 "0R" RESC1608X55X25NL10T15 995,900 r0 top value=0Ω
R166 "0R" RESC1608X55X25NL10T15 1201,1106 r270 top value=0Ω
R167 "0R" RESC1608X55X25NL10T15 1269,1106 r270 top value=0Ω
R168 "0R" RESC1608X55X25NL10T15 1337,1106 r270 top value=0Ω
R169 "0R" RESC1608X55X25NL10T15 1406,1106 r270 top value=0Ω
R170 "0R" RESC1608X55X25NL10T15 1473,1106 r270 top value=0Ω
R171 "1M" RESC1608X55X25NL10T15 1570,557 r180 top value=1MΩ
R172 "0R" RESC1608X55X25NL10T15 1759,1077 r0 top value=0Ω
R173 "1K" RESC1608X55X25NL10T15 3124,1191 r180 top value=1kΩ
R174 "4K7" RESC1608X55X25NL10T15 1567,636 r180 top value=4.7kΩ
R175 "10K" RESC1608X55X25NL10T15 2846,1201 r270 top value=10kΩ
R176 "100K" RESC1608X55X25NL10T15 1571,775 r0 top value=100kΩ
R177 "10K" RESC1608X55X25NL10T15 2896,1201 r90 top value=10kΩ
R178 "0R" RESC1608X55X25NL10T15 1132,1105 r270 top value=0Ω
R179 "0R" RESC1608X55X25NL10T15 995,753 r0 top value=0Ω
R180 "100K" RESC1608X55X25NL10T15 992,599 r0 top value=100kΩ
R181 "620R" RESC1608X55X25NL10T15 744,488 r180 top value=620Ω
R182 "47K" RESC1608X55X25NL10T15 782,627 r180 top value=47kΩ
R183 "0R" RESC1608X55X25NL10T15 773,702 r0 top value=0Ω
R184 "0R" RESC1608X55X25NL10T15 792,806 r90 top value=0Ω
R185 "10K" RESC1608X55X25NL10T15 721,851 r270 top value=10kΩ
R186 "330R" RESC1608X55X25NL10T15 1015,400 r0 top value=330Ω
R187 "47K" RESC1608X55X25NL10T15 738,1082 r90 top value=47kΩ
R188 "22K" RESC1608X55X25NL10T15 1046,214 r0 top value=22kΩ
R189 "33R" RESC1608X55X25NL10T15 1073,1673 r0 top value=33Ω
R190 "33R" RESC1608X55X25NL10T15 1802,1660 r0 top value=33Ω
R191 "33R" RESC1608X55X25NL10T15 1641,1631 r0 top value=33Ω
R192 "33R" RESC1608X55X25NL10T15 2550,1458 r0 top value=33Ω
R193 "33R" RESC1608X55X25NL10T15 1069,1513 r0 top value=33Ω
R194 "33R" RESC1608X55X25NL10T15 1645,1336 r0 top value=33Ω
R195 "33R" RESC1608X55X25NL10T15 1896,1256.56 r90 top value=33Ω
R196 "33R" RESC1608X55X25NL10T15 2522,1110 r270 top value=33Ω
R197 "10K" RESC1608X55X25NL10T15 1069,1562 r180 top value=10kΩ
R198 "10K" RESC1608X55X25NL10T15 1069,1464 r180 top value=10kΩ
R199 "10K" RESC1608X55X25NL10T15 4093,3623 r0 top value=10kΩ
R200 "10K" RESC1608X55X25NL10T15 4134,3573 r0 top value=10kΩ
R201 "10K" RESC1608X55X25NL10T15 4312.67,3751 r180 top value=10kΩ
R202 "10K" RESC1608X55X25NL10T15 4093,3673 r0 top value=10kΩ
R203 "10K" RESC1608X55X25NL10T15 4093,3723 r0 top value=10kΩ
R204 "0R" RESC1608X55X25NL10T15 4181,3317 r90 top value=0Ω
R205 "10K" RESC1608X55X25NL10T15 4130,3317 r270 top value=10kΩ
R206 "4K7" RESC1608X55X25NL10T15 4017,730 r90 top value=4.7kΩ
R207 "0R" RESC1608X55X25NL10T15 4136,734 r90 top value=0Ω
R208 "100R" RESC1608X55X25NL10T15 2052,731 r0 top value=100Ω
R209 "330R" RESC1608X55X25NL10T15 2047,899 r0 top value=330Ω
R210 "100R" RESC1608X55X25NL10T15 3915,624 r90 top value=100Ω
R211 "220K" RESC1608X55X25NL10T15 2052,783 r0 top value=220kΩ
R212 "620R" RESC1608X55X25NL10T15 4355,168 r0 top value=620Ω
R213 "620R" RESC1608X55X25NL10T15 4353,218 r0 top value=620Ω
R214 "620R" RESC1608X55X25NL10T15 4304,360 r0 top value=620Ω
R215 "620R" RESC1608X55X25NL10T15 4350,269 r0 top value=620Ω
R216 "0R" RESC1608X55X25NL10T15 2961,2371 r270 top value=0Ω
R217 "0R" RESC1608X55X25NL10T15 3012,2371 r90 top value=0Ω
R218 "4K7" RESC1608X55X25NL10T15 3062,2371 r270 top value=4.7kΩ
R219 "0R" RESC1608X55X25NL10T15 3112,2371 r90 top value=0Ω
R220 "820R" RESC1608X55X25NL10T15 2485,2105 r180 top value=820Ω
R221 "1K" RESC1608X55X25NL10T15 2336,3598.56 r270 top value=1kΩ
R222 "100K" RESC1608X55X25NL10T15 2290,3708 r90 top value=100kΩ
R223 "2.7K" RESC1608X55X25NL10T15 2063,3595 r90 top value=2.7kΩ
R224 "100R" RESC1608X55X25NL10T15 1723,3914 r90 top value=100Ω
R225 "10K" RESC1608X55X25NL10T15 1839,3605.44 r90 top value=10kΩ
R226 "4K7" RESC1608X55X25NL10T15 929,3585 r180 top value=4.7kΩ
R227 "4K7" RESC1608X55X25NL10T15 1005,3553 r270 top value=4.7kΩ
R228 "4K7" RESC1608X55X25NL10T15 2000,3597 r90 top value=4.7kΩ
R229 "330R" RESC1608X55X25NL10T15 2524,4092 r270 top value=330Ω
R230 "330R" RESC1608X55X25NL10T15 2459,4128.56 r90 top value=330Ω
R231 "3K" RESC1608X55X25NL10T15 2382,3942 r270 top value=3kΩ
R232 "10K" RESC1608X55X25NL10T15 1571,4131 r180 top value=10kΩ
R233 "10K" RESC1608X55X25NL10T15 1055,3553 r90 top value=10kΩ
R234 "330R" RESC1608X55X25NL10T15 4182,1317 r270 top value=330Ω
R235 "0R" RESC1608X55X25NL10T15 4082,1317 r270 top value=0Ω
R236 "0R" RESC1608X55X25NL10T15 3970,1178 r0 top value=0Ω
R237 "0R" RESC1608X55X25NL10T15 4298,1324 r270 top value=0Ω
R238 "0R" RESC1608X55X25NL10T15 4232,1317 r270 top value=0Ω
R239 "10K" RESC1608X55X25NL10T15 4132,1317 r270 top value=10kΩ
R240 "4K7" RESC1608X55X25NL10T15 6444,2128 r180 top value=4.7kΩ
R241 "4K7" RESC1608X55X25NL10T15 6447,2660 r180 top value=4.7kΩ
R242 "4K7" RESC1608X55X25NL10T15 6547,1784 r180 top value=4.7kΩ
R243 "4K7" RESC1608X55X25NL10T15 6445,1877 r180 top value=4.7kΩ
R244 "4K7" RESC1608X55X25NL10T15 6443,2213 r180 top value=4.7kΩ
R245 "4K7" RESC1608X55X25NL10T15 6445,1968 r0 top value=4.7kΩ
R246 "4K7" RESC1608X55X25NL10T15 6448,2741 r180 top value=4.7kΩ
R247 "4K7" RESC1608X55X25NL10T15 6400,4700 r90 top value=4.7kΩ
R248 "4K7" RESC1608X55X25NL10T15 6300,4700 r90 top value=4.7kΩ
R249 "22R" RESC1608X55X25NL10T15 4007,4299 r180 top value=22Ω
R250 "22R" RESC1608X55X25NL10T15 2404,4502 r0 top value=22Ω
R251 "22R" RESC1608X55X25NL10T15 1888.56,4507 r0 top value=22Ω
R252 "22R" RESC1608X55X25NL10T15 1938,4304 r0 top value=22Ω
R253 "22R" RESC1608X55X25NL10T15 3980,3638 r90 top value=22Ω
R254 "22R" RESC1608X55X25NL10T15 1605,4362 r0 top value=22Ω
R255 "22K" RESC1608X55X25NL10T15 2434,4411 r180 top value=22kΩ
R256 "22K" RESC1608X55X25NL10T15 1766.44,4306 r180 top value=22kΩ
R257 "100R" RESC1608X55X25NL10T15 1482,3596 r180 top value=100Ω
R258 "10K" RESC1608X55X25NL10T15 4033,4412 r0 top value=10kΩ
R259 "10K" RESC1608X55X25NL10T15 4032,4533 r0 top value=10kΩ
R260 "10K" RESC1608X55X25NL10T15 4033,4610 r0 top value=10kΩ
R261 "620R" RESC1608X55X25NL10T15 4456,168 r0 top value=620Ω
R262 "620R" RESC1608X55X25NL10T15 4404.56,320 r0 top value=620Ω
R263 "620R" RESC1608X55X25NL10T15 4404,369 r0 top value=620Ω
R264 "620R" RESC1608X55X25NL10T15 4452,268 r0 top value=620Ω
R265 "10K" RESC1608X55X25NL10T15 2860,2615 r90 top value=10kΩ
R266 "0R" RESC1608X55X25NL10T15 3673,5121 r90 top value=0Ω
R267 "100R" RESC1608X55X25NL10T15 3621,5121 r90 top value=100Ω
RV1 "3386P-1-103TLF" POT_3386P 1857,308 r0 top value=10kΩ
S1 "SWITCH" FP-PTS645SH50SMTR92LFS-MFG 2631,2874 r180 top
S2 "SWITCH" FP-PTS645SH50SMTR92LFS-MFG 1857,2737 r90 top
S3 "SWITCH" FP-PTS645SH50SMTR92LFS-MFG 3963,239 r180 top
S4 "SWITCH" FP-PTS645SH50SMTR92LFS-MFG 2348,444 r90 top
SB1 "SBARC" NET_TIE 4225,3200 r0 top net-tie
SB2 "SBARC" NET_TIE 2297,1020 r90 top net-tie
SB3 "SBARC" NET_TIE 1186,320 r90 top net-tie
SB4 "SBARC" NET_TIE 6177.49,1941.02 r90 top net-tie
SB5 "SBARC" NET_TIE 885,326 r90 top net-tie
SB6 "SBARC" NET_TIE 4069,4068 r180 top net-tie
SB7 "SBARC" NET_TIE 4126,3803 r0 top net-tie
SB8 "SBARC" NET_TIE 4102,3927 r90 top net-tie
SB9 "SBARC" NET_TIE 4445,4441 r180 top net-tie
SB10 "SBARC" NET_TIE 4916,4449 r180 top net-tie
SB11 "SBARC" NET_TIE 4684,4441 r180 top net-tie
SB12 "SBARC" NET_TIE 5047,4347 r180 top net-tie
SB13 "SBARC" NET_TIE 2939,4515 r180 top net-tie
SB14 "SBARC" NET_TIE 3137,2783 r270 top net-tie
SB15 "SBARC" NET_TIE 2933,4610 r180 top net-tie
SB16 "SBARC" NET_TIE 3644,3355 r90 top net-tie
SB17 "SBARC" NET_TIE 853,1161 r0 top net-tie
SB18 "SBARC" NET_TIE 555,4164 r270 top net-tie
SB19 "SBARC" NET_TIE 860,1242 r90 top net-tie
SB20 "SBARC" NET_TIE 3208,2361 r270 top net-tie
SB21 "SBARC" NET_TIE 1547,3437 r270 top net-tie
SB22 "SBARC" NET_TIE 2557,2658 r90 top net-tie
SB23 "SBARC" NET_TIE 1508,1783 r0 top net-tie
SB24 "SBARC" NET_TIE 4724,3558 r90 top net-tie
SB25 "SBARC" NET_TIE 2615,1605 r90 top net-tie
SB26 "SBARC" NET_TIE 3047,3310 r270 top net-tie
SB27 "SBARC" NET_TIE 3603,3297 r270 top net-tie
SB28 "SBARC" NET_TIE 3067,3104 r90 top net-tie
SB29 "SBARC" NET_TIE 3581,2319 r180 top net-tie
SB30 "SBARC" NET_TIE 3491,3383 r0 top net-tie
SB31 "SBARC" NET_TIE 3345,3155 r180 top net-tie
SB32 "SBARC" NET_TIE 3134,2678 r270 top net-tie
SB33 "SBARC" NET_TIE 2966,2871 r0 top net-tie
SB34 "SBARC" NET_TIE 4343,3922 r90 top net-tie
SB35 "SBARC" NET_TIE 2893,2951 r0 top net-tie
SB36 "SBARC" NET_TIE 2881,2713 r90 top net-tie
SB37 "SBARC" NET_TIE 871,3355 r0 top net-tie
SB38 "SBARC" NET_TIE 710,3301 r0 top net-tie
SB39 "SBARC" NET_TIE 1247,610 r180 top net-tie
SB40 "SBARC" NET_TIE 1132,637 r270 top net-tie
SB41 "SBARC" NET_TIE 529,3949 r90 top net-tie
ST1A "STM32F723IEK6" IC_STM32F723IEK6 2004.18,3961.18 r0 top
SW1 "JS203011CQN" FP-JS203011CQN-MFG 4556,4189 r180 top
T1 "MMBT2222A-7-F" FP-SOT23-MFG 2438,1313 r0 top
T2 "MMBT2222A-7-F" FP-SOT23-MFG 3574,1169 r0 top
T3 "BSS138P,215" FP-SOT23-IPC_A 1896,1082 r0 top
T4 "MMBT2222A-7-F" FP-SOT23-MFG 2982,1201 r0 top
T5 "MMBT2222A-7-F" FP-SOT23-MFG 1042,314 r90 top
U1A "STM32H743XIH6" FP-TFBGA240+25-A07U-MFG 3637.02,2734.01 r0 top
X1 "CG06750-25M" FP-NX3215SA-MFG 2806,2376 r0 top
X2 "CRYSTALL" FP-402-MFG 3039.65,3028.56 r90 top
X3 "CRYSTALL" FP-402-MFG 3154,4740 r0 top
X4 "CRYSTALL" FP-402-MFG 1567,451 r180 top
X5 "402F32011CAR" FP-402-MFG 1577.65,4038.44 r270 top

## Footprints (in the part's own frame and the unit in brackets; to place one, negate y for a bottom-side part, rotate by r counter-clockwise, add the part's x,y. Pads: shape width x height; smd on the part's side, far side on the other; paste and mask are expansions set on the pad)
61300311121 [mm] "Pin Header, pitch 2.54 mm, THT, Vertical, single row, 3p"
  rrect50% 1.6x1.6 hole 1.1: 1(-2.54,0)
  round 1.6 hole 1.1: 2(0,0) 3(2.54,0)
  silkscreen extent -4.53,-1.35 3.96,1.35, body extent -3.81,-1.27 3.81,1.27, height 8.57
687140149022 [mm] "0.50mm SMT ZIF Horizontal Hinge Type Bottom Contact, 40p"
  rect 0.3x1.3 smd: 1(-9.75,3.35) 2(-9.25,3.35) 3(-8.75,3.35) 4(-8.25,3.35) 5(-7.75,3.35) 6(-7.25,3.35) 7(-6.75,3.35) 8(-6.25,3.35) 9(-5.75,3.35) 10(-5.25,3.35) 11(-4.75,3.35) 12(-4.25,3.35) 13(-3.75,3.35) 14(-3.25,3.35) 15(-2.75,3.35) 16(-2.25,3.35) 17(-1.75,3.35) 18(-1.25,3.35) 19(-0.75,3.35) 20(-0.25,3.35) 21(0.25,3.35) 22(0.75,3.35) 23(1.25,3.35) 24(1.75,3.35) 25(2.25,3.35) 26(2.75,3.35) 27(3.25,3.35) 28(3.75,3.35) 29(4.25,3.35) 30(4.75,3.35) 31(5.25,3.35) 32(5.75,3.35) 33(6.25,3.35) 34(6.75,3.35) 35(7.25,3.35) 36(7.75,3.35) 37(8.25,3.35) 38(8.75,3.35) 39(9.25,3.35) 40(9.75,3.35)
  rect 2x1.8 smd: M1(-11.55,0.6) M2(11.55,0.6)
  body extent -12.05,-2.9 12.05,3.6, height 2.25
BAT_1056 [mm]
  rect 3.6x2.6 smd: N(7.61,0) P(-8.18,0)
  round 1.3 hole 1.3 unplated: ""(-3.98,0)
  round 1 hole 1 unplated: ""(3.51,0)
  silkscreen extent -11.74,-0.34 -10.74,0.66, body extent -6.36,-9.34 8.78,9.46, height 1.83
BEADC1608X100N [mm]
  rect 0.94x1.02 smd: 1(-0.79,0) 2(0.79,0)
  body extent -0.8,-0.4 0.8,0.4, height 1
CON14_2X7_DU_FTSH_SAI [mil]
  rect 30x110 smd paste+0 mask+0: 1(150,-80) 2(150,80) 3(100,-80) 4(100,80) 5(50,-80) 6(50,80) 7(0,-80) 8(0,80) 9(-50,-80) 10(-50,80) 11(-100,-80) 12(-100,80) 13(-150,-80) 14(-150,80)
  silkscreen extent -180,-72 180,72, body extent -175,-123 175,123, height 235
CONN50_878325020_MOL [mil]
  rect 39x108 smd: 1(-944.88,-83.68) 2(-944.88,83.65) 3(-866.14,-83.68) 4(-866.14,83.65) 5(-787.4,-83.68) 6(-787.4,83.65) 7(-708.66,-83.68) 8(-708.66,83.65) 9(-629.92,-83.68) 10(-629.92,83.65) 11(-551.18,-83.68) 12(-551.18,83.65) 13(-472.44,-83.68) 14(-472.44,83.65) 15(-393.7,-83.68) 16(-393.7,83.65) 17(-314.96,-83.68) 18(-314.96,83.65) 19(-236.22,-83.68) 20(-236.22,83.65) 21(-157.48,-83.68) 22(-157.48,83.65) 23(-78.74,-83.68) 24(-78.74,83.65) 25(0,-83.68) 26(0,83.65) 27(78.74,-83.68) 28(78.74,83.65) 29(157.48,-83.68) 30(157.48,83.65) 31(236.22,-83.68) 32(236.22,83.65) 33(314.96,-83.68) 34(314.96,83.65) 35(393.7,-83.68) 36(393.7,83.65) 37(472.44,-83.68) 38(472.44,83.65) 39(551.18,-83.68) 40(551.18,83.65) 41(629.92,-83.68) 42(629.92,83.65) 43(708.66,-83.68) 44(708.66,83.65) 45(787.4,-83.68) 46(787.4,83.65) 47(866.14,-83.68) 48(866.14,83.65) 49(944.88,-83.68) 50(944.88,83.65)
  round 41 hole 41 unplated: ""(-906,0) ""(906,0)
  body extent -1031,-118 1041,130, height 351
CONN_1050170001_MOL [mil]
  rect 16x53 smd paste+0 mask+0: 1(-51.18,99.61) 2(-25.59,99.61) 3(0,99.61) 4(25.59,99.61) 5(51.18,99.61)
  round 57 hole 33 paste-99999 mask-28.5: 6(-98.43,100.59) 7(98.43,100.59)
  rect 59x75 smd paste-37.5 mask-37.5: 10(-39.37,-5.7) 11(39.37,-5.7)
  round 24 hole 24 unplated paste-99999 mask+0: S_1_H1(-124,16) S_1_H2(-125,-34) S_2_H1(135,15) S_2_H2(135,-22)
  silkscreen extent -163,-112 163,112, body extent -161,-100 161,113, height 107
CONN_F09S5Y-1002_MOL [mil]
  round 59 hole 39 paste-99999 mask+0: 1(0,0) 2(108.03,0) 3(216.06,0) 4(324.09,0) 5(432.13,0) 6(54.02,-100) 7(162.05,-100) 8(270.08,-100) 9(378.11,-100)
  silkscreen extent -395,-755 828,105, body extent -395,-751 825,100, height 404
DIODE_ESDALC6V1-1U2 [mm]
  rect 0.425x0.3 smd paste-1 mask+0.05: 1(-0.312,0) 2(0.312,0)
  body extent -0.3,-0.15 0.3,0.15, height 0.33
FIL_BNX002-11 [mm]
  rect 1.8x1.8 hole 1.2: 1(2.5,2.5)
  round 1.8 hole 1.2: 2(2.5,-2.5) 3(-2.5,2.5) 4(-2.5,-2.5) 5(0,0) 6(5,0)
  silkscreen extent -6,-5.5 6,6.35, body extent -6,-5.5 6,5.5, height 13
FP-0ZCJ0010FF2E-MFG [mm]
  rect 1x1.9 smd paste+0 mask+0: 1(-1.5,0) 2(1.5,0)
  silkscreen extent -0.63,-0.9 0.63,0.9, body extent -2.1,-1.05 2.1,1.05, height 0.25
FP-402-MFG [mm]
  rect 0.9x0.8 smd paste+0 mask+0: 1(-0.7,-0.55) 2(0.7,-0.55) 3(0.7,0.55) 4(-0.7,0.55)
  body extent -1.25,-1.05 1.25,1.05, height 0.25
FP-1610-MFG [mm]
  rect 0.55x0.8 smd paste-1000 mask+0: 1(-0.625,0) 2(0.625,0)
  body extent -1,-0.65 1,0.65, height 0.25
FP-505110-0892-MFG [mm]
  rect 0.3x1 smd paste+0 mask+0: 1(-1.75,2.475) 2(-1.25,2.475) 3(-0.75,2.475) 4(-0.25,2.475) 5(0.25,2.475) 6(0.75,2.475) 7(1.25,2.475) 8(1.75,2.475)
  rect 2x1.3 smd paste+0 mask+0: 9(-4.05,-0.225) 10(4.05,-0.225)
  silkscreen extent -4.45,-2.73 4.45,3.65, body extent -5.15,-2.83 5.15,3.08, height 0.25
FP-BAT60JFILM-MFG [mm]
  rect 0.86x0.54 smd paste+0 mask+0: 1(-1.07,0) 2(1.07,0)
  silkscreen extent -2.2,-0.72 0.9,0.72, body extent -1.6,-0.82 1.6,0.82, height 0.25
FP-C04-057-SN-MFG [mm]
  rect 1.55x0.6 smd paste+0 mask+0: 1(-2.7,1.905) 2(-2.7,0.635) 3(-2.7,-0.635) 4(-2.7,-1.905) 5(2.7,-1.905) 6(2.7,-0.635) 7(2.7,0.635) 8(2.7,1.905)
  silkscreen extent -1.55,-2.5 1.55,2.5, body extent -3.57,-2.75 3.57,2.75, height 0.25
FP-C04-143B-S4QFN-IPC_C [mm]
  rect 0.761x0.239 smd paste+0 mask+0: 1(-1.876,1.25)
  rrect100% 0.761x0.239 smd paste+0 mask+0: 2(-1.876,0.75) 3(-1.876,0.25) 4(-1.876,-0.25) 5(-1.876,-0.75) 6(-1.876,-1.25) 13(1.876,-1.25) 14(1.876,-0.75) 15(1.876,-0.25) 16(1.876,0.25) 17(1.876,0.75) 18(1.876,1.25)
  rrect100% 0.239x0.761 smd paste+0 mask+0: 7(-1.25,-1.876) 8(-0.75,-1.876) 9(-0.25,-1.876) 10(0.25,-1.876) 11(0.75,-1.876) 12(1.25,-1.876) 19(1.25,1.876) 20(0.75,1.876) 21(0.25,1.876) 22(-0.25,1.876) 23(-0.75,1.876) 24(-1.25,1.876)
  rect 2.6x2.6 smd paste-1000 mask+0: 25(0,0)
  silkscreen extent -2,-2 2,2, body extent -2.36,-2.36 2.36,2.36, height 0.25
FP-CC0402-IPC_C [mil]
  rect 18.43x18.6 smd paste+0 mask+0: 1(-15.83,0) 2(15.83,0)
  body extent -29,-15 29,15, height 10
FP-HCLGA-DM00231908-MFG [mm]
  rect 0.4x0.95 smd paste+0 mask+0: 1(-0.425,0.675) 2(-0.425,-0.675) 3(0.425,-0.675) 4(0.425,0.675)
  rect 0.35x2.3 smd paste+0 mask+0: 5(-1.225,0) 5(1.225,0)
  rect 1.3x0.35 smd paste+0 mask+0: 5(0,-1.725) 5(0,1.725)
  silkscreen extent -2.57,-2.05 1.55,2.05, body extent -2.05,-2.55 2.05,2.55, height 0.25
FP-JS203011CQN-MFG [mm]
  rect 1.4x1.4 hole 0.9 paste-2539.97 mask+0: 1(-4,-1.65)
  round 1.4 hole 0.9 paste-2539.97 mask+0: 2(-2,-1.65) 3(2,-1.65) 4(4,-1.65) 5(-4,1.65) 6(-2,1.65) 7(2,1.65) 8(4,1.65)
  silkscreen extent -6.5,-1.8 6.5,1.8, body extent -6.6,-2.45 6.6,2.45, height 0.25
FP-NX3215SA-MFG [mm]
  rect 1x1.8 smd paste+0 mask+0: 1(-1.25,0) 2(1.25,0)
  silkscreen extent -0.38,-0.8 0.38,0.8, body extent -1.85,-1 1.85,1, height 0.25
FP-PJ-102A-MFG [mm]
  rrect100% 2.54x1.6 hole 1 paste-2539.97 mask+0: 1(-0.127,-6.401) 2(0,-0.5)
  rrect100% 1.6x2.54 hole 1 paste-2539.97 mask+0: 3(-4.597,-3.658)
  silkscreen extent -4.6,-8.08 4.6,7.3, body extent -5.6,-7.4 4.7,7.4, height 0.25